# Altium PCB ESC_v0.PcbDoc (part 1 of 2)
Units mm, origin at the board's own origin, x right, y up, seen from the top; angles counter-clockwise.
Board outline 41.25 x 47.75 mm, 4 copper layers (Top Layer, Mid Layer 1, Mid Layer 2, Bottom Layer), stack 1.65 mm thick; 224 components, 141 nets, 1063 pads, 210 vias.
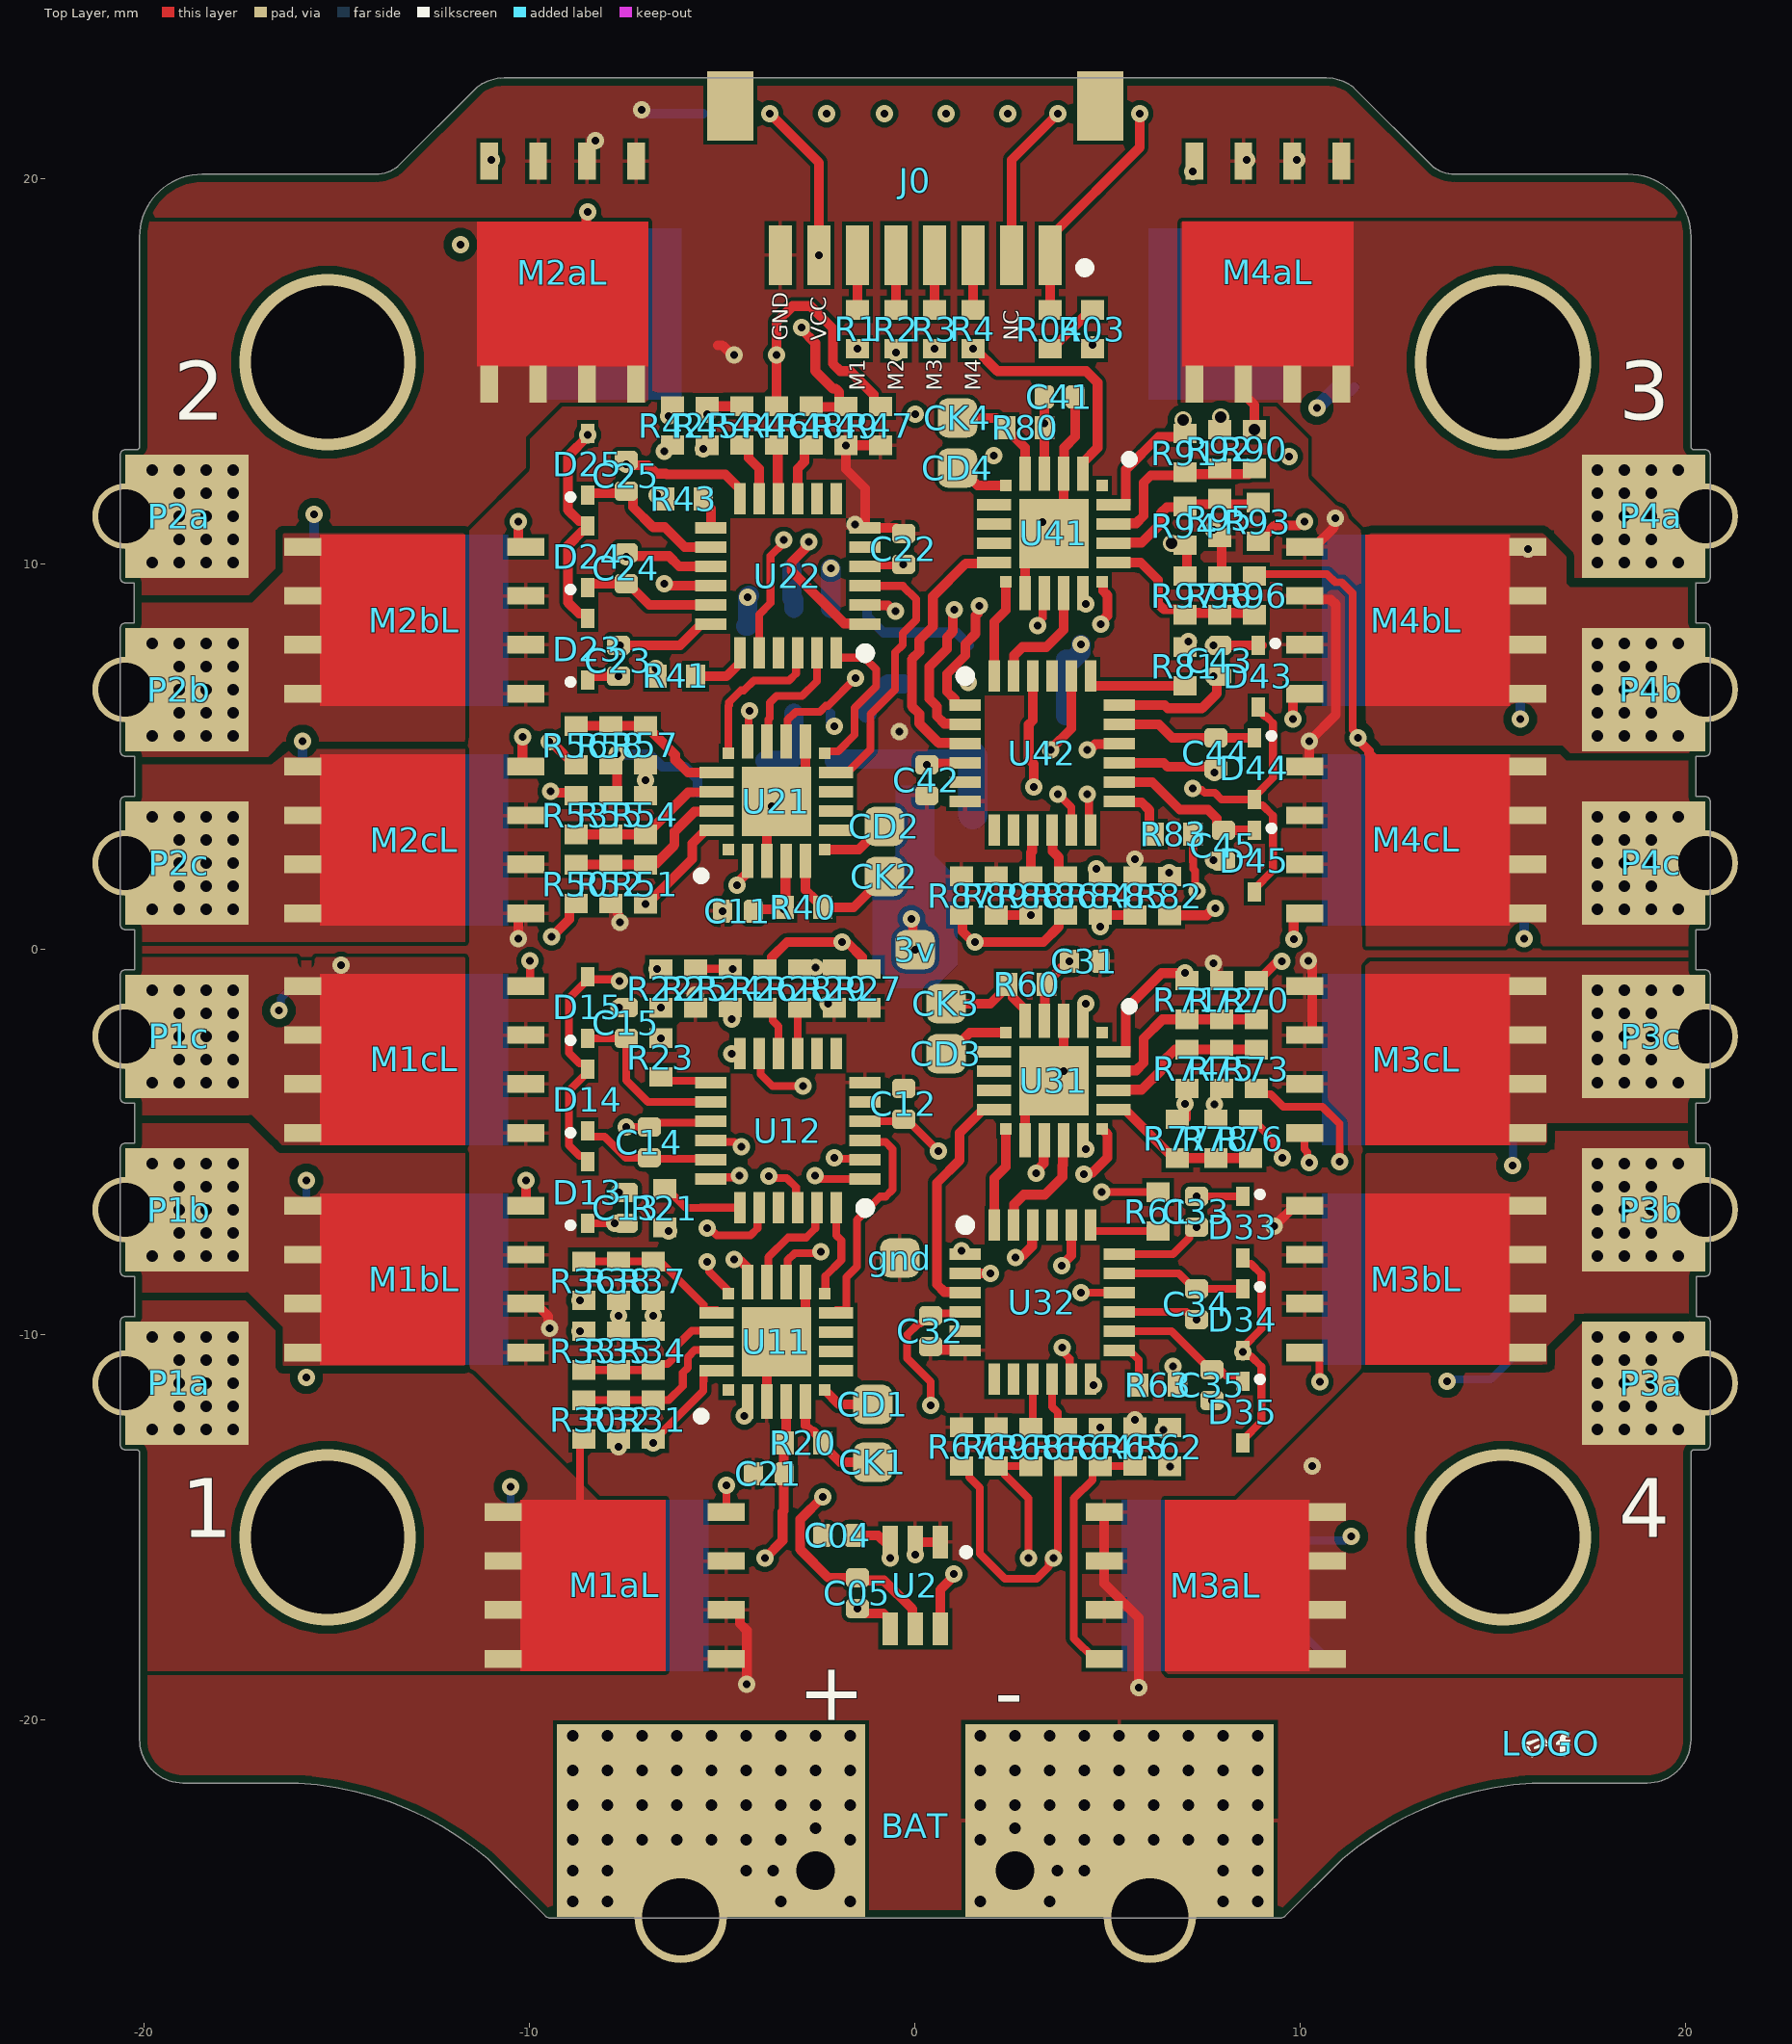
[diagram p0: Top Layer view]
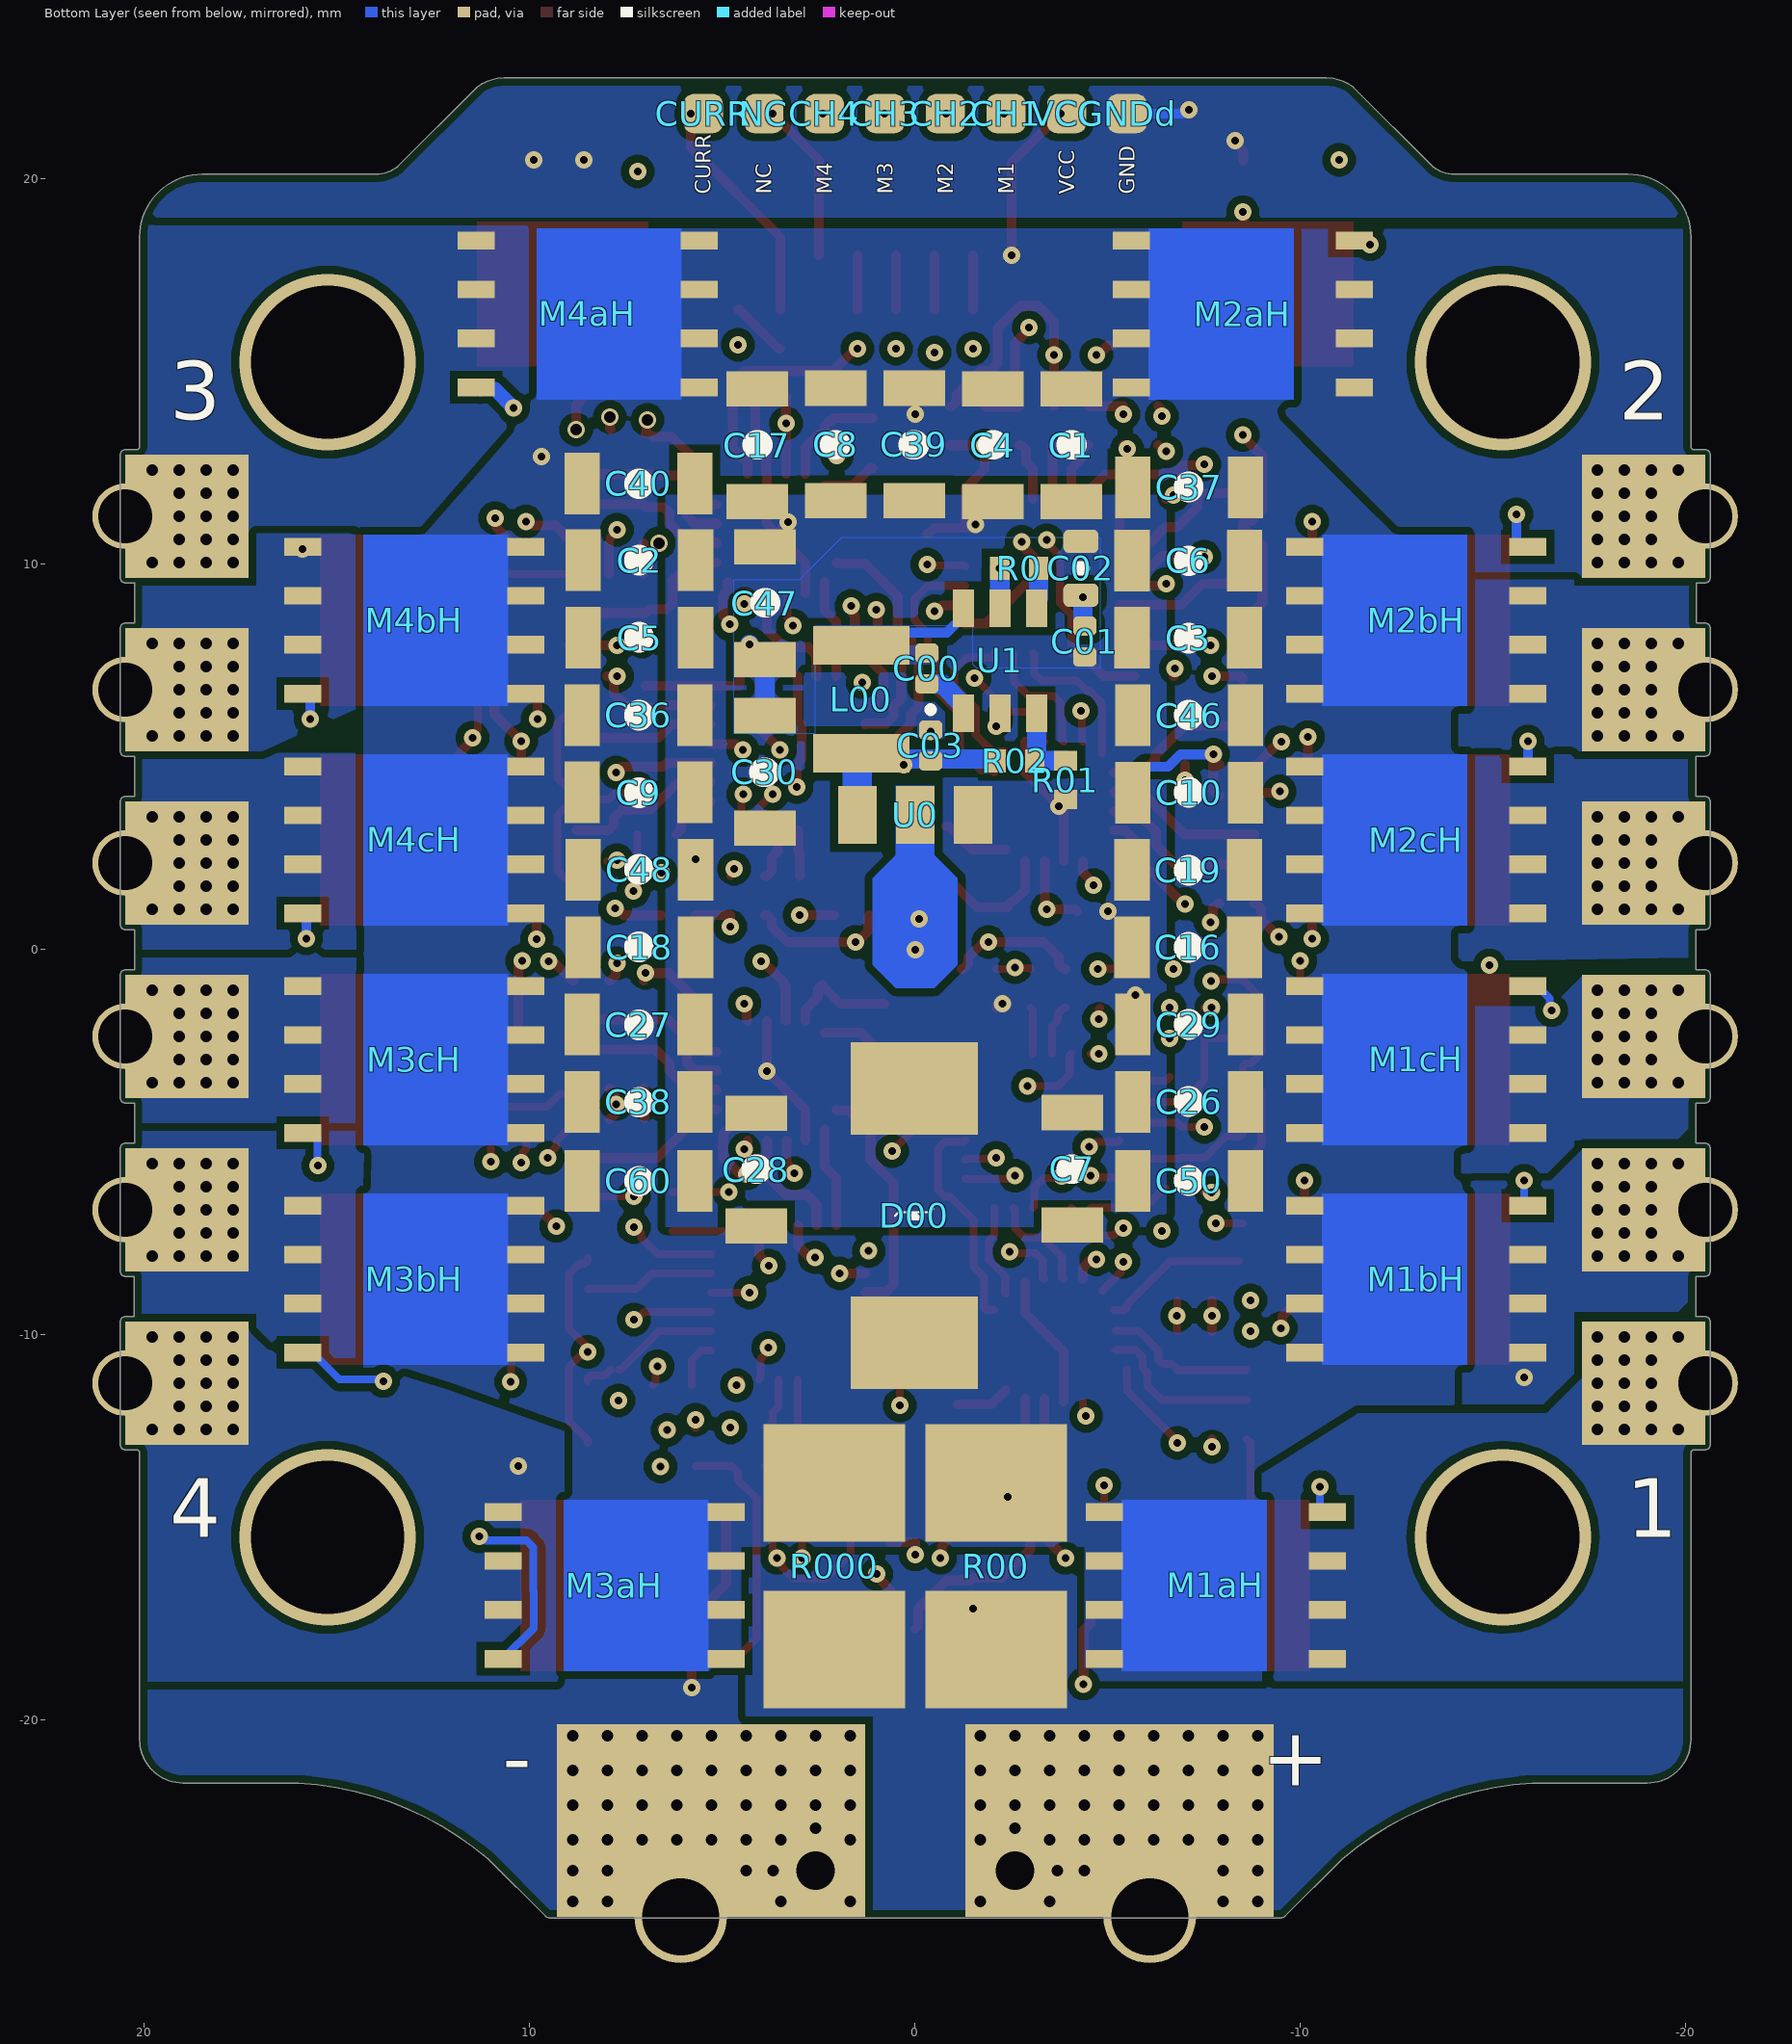
[diagram p1: Bottom Layer view, seen from below]
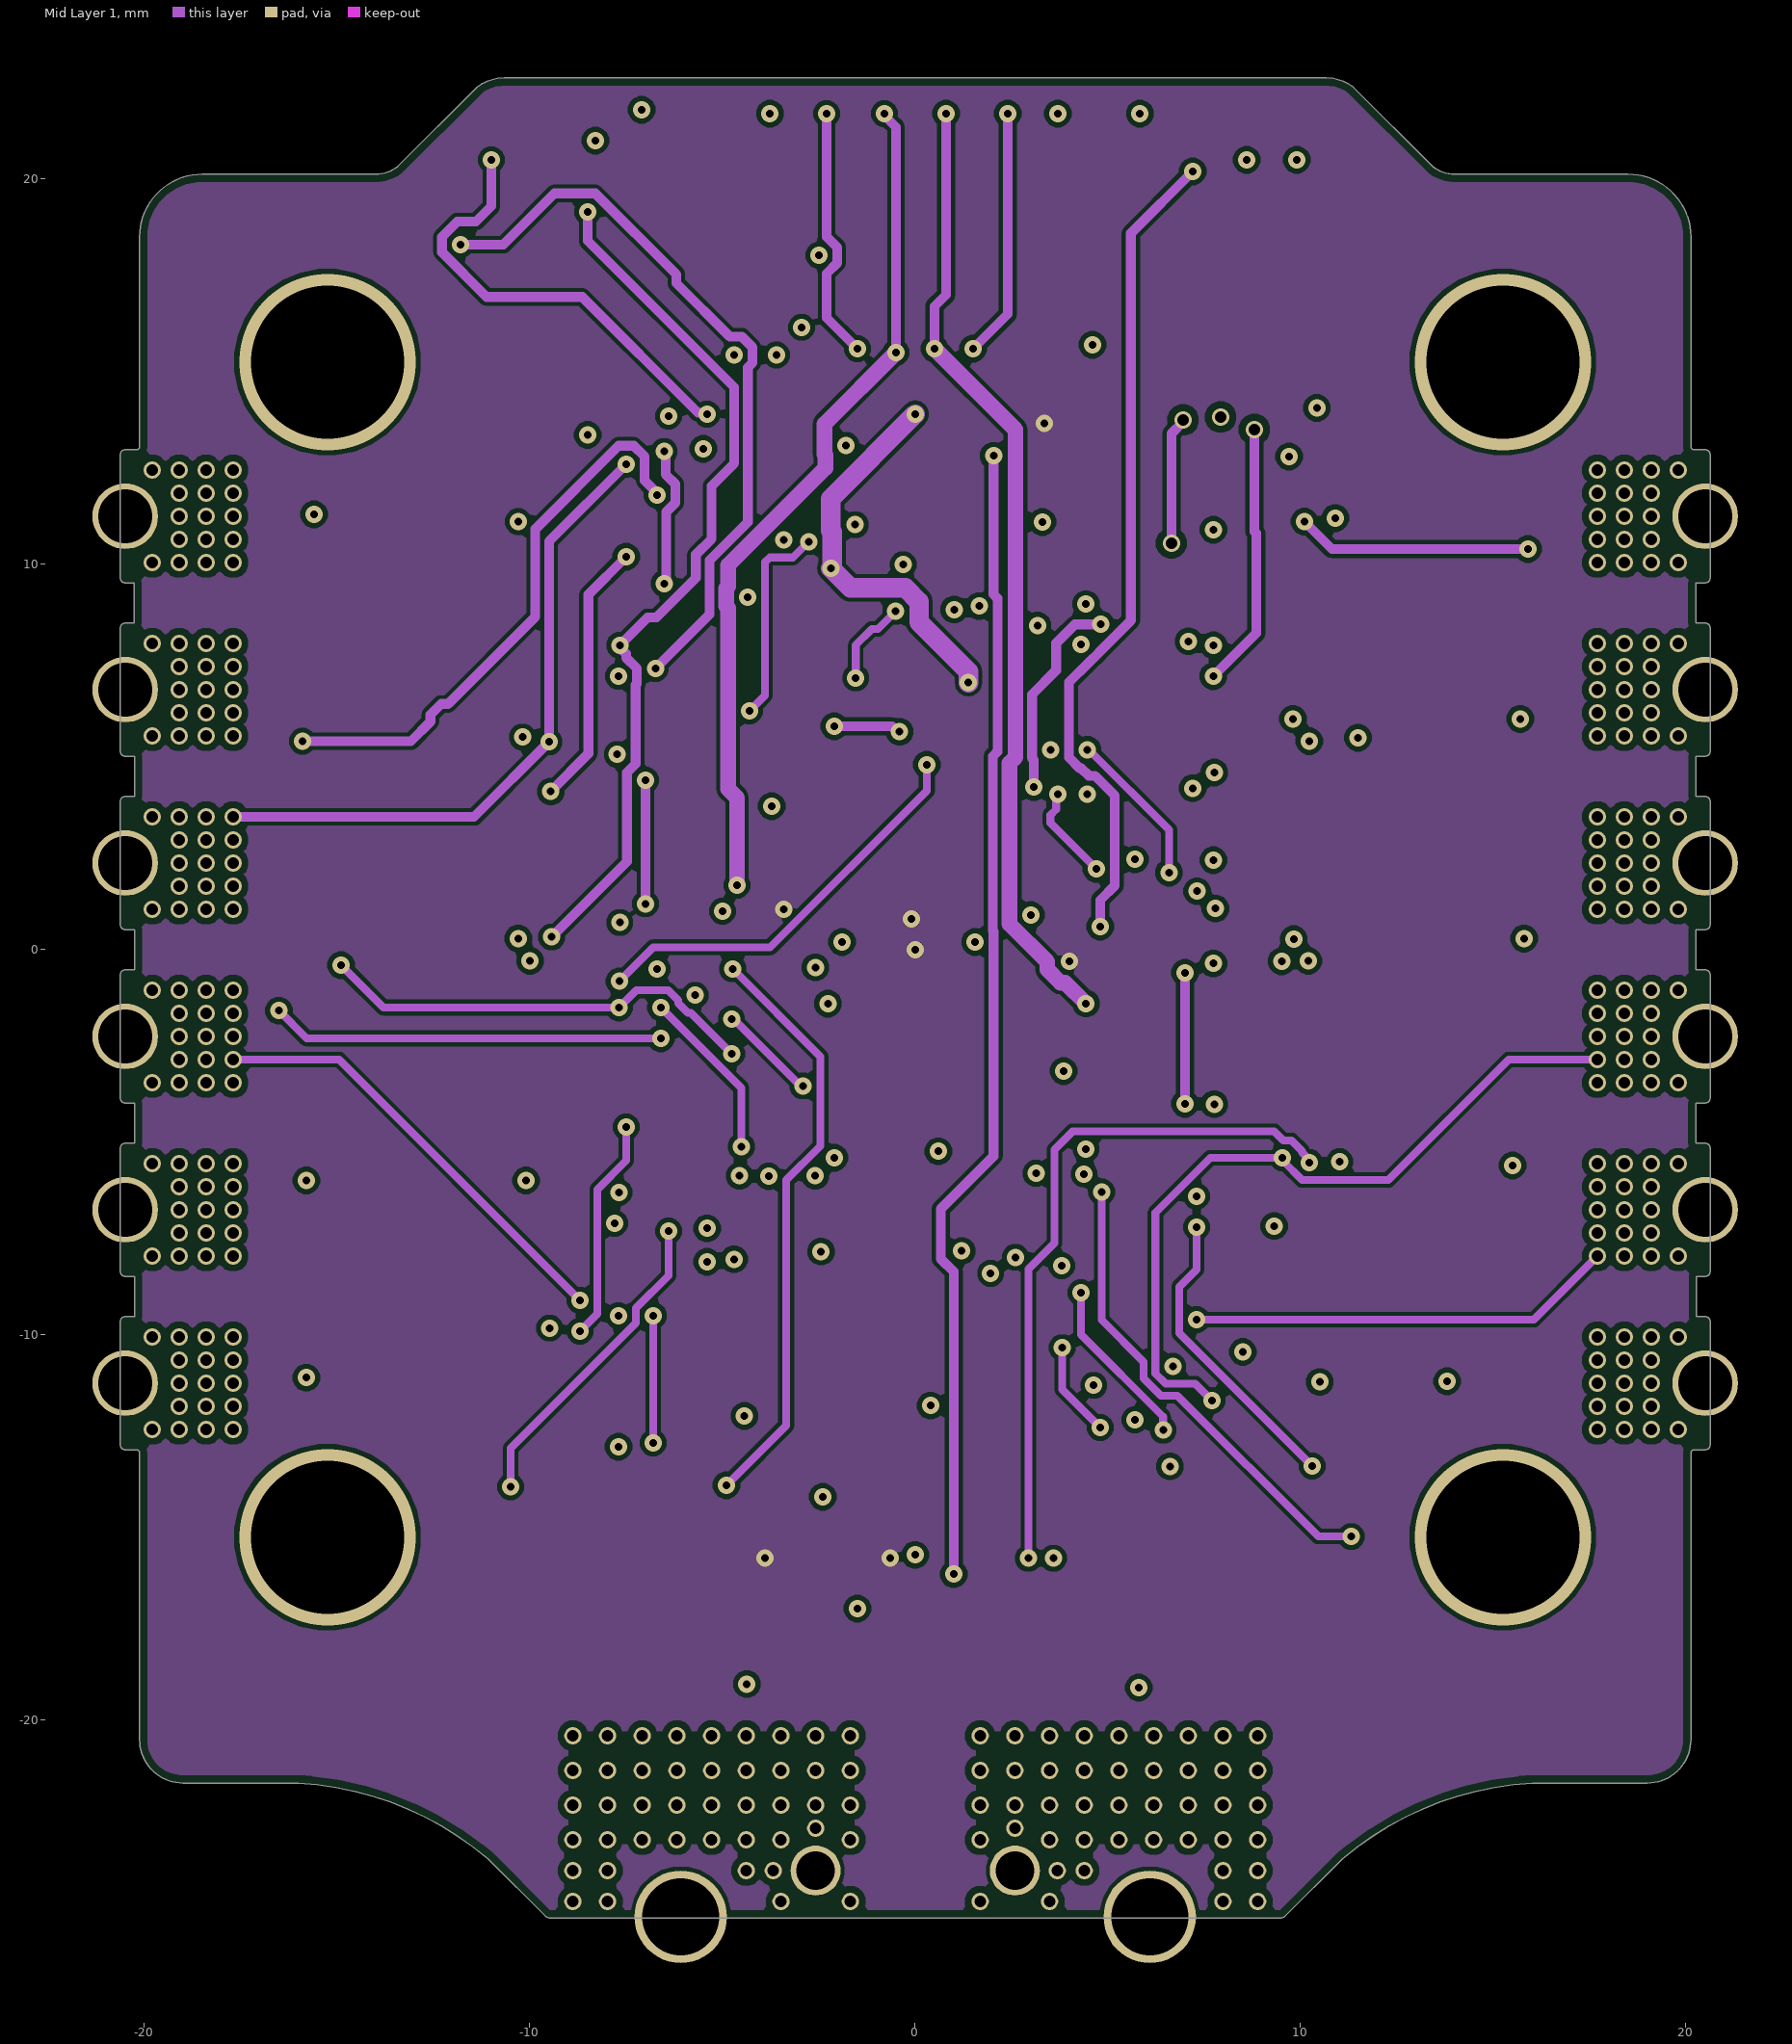
[diagram p2: Mid Layer 1]
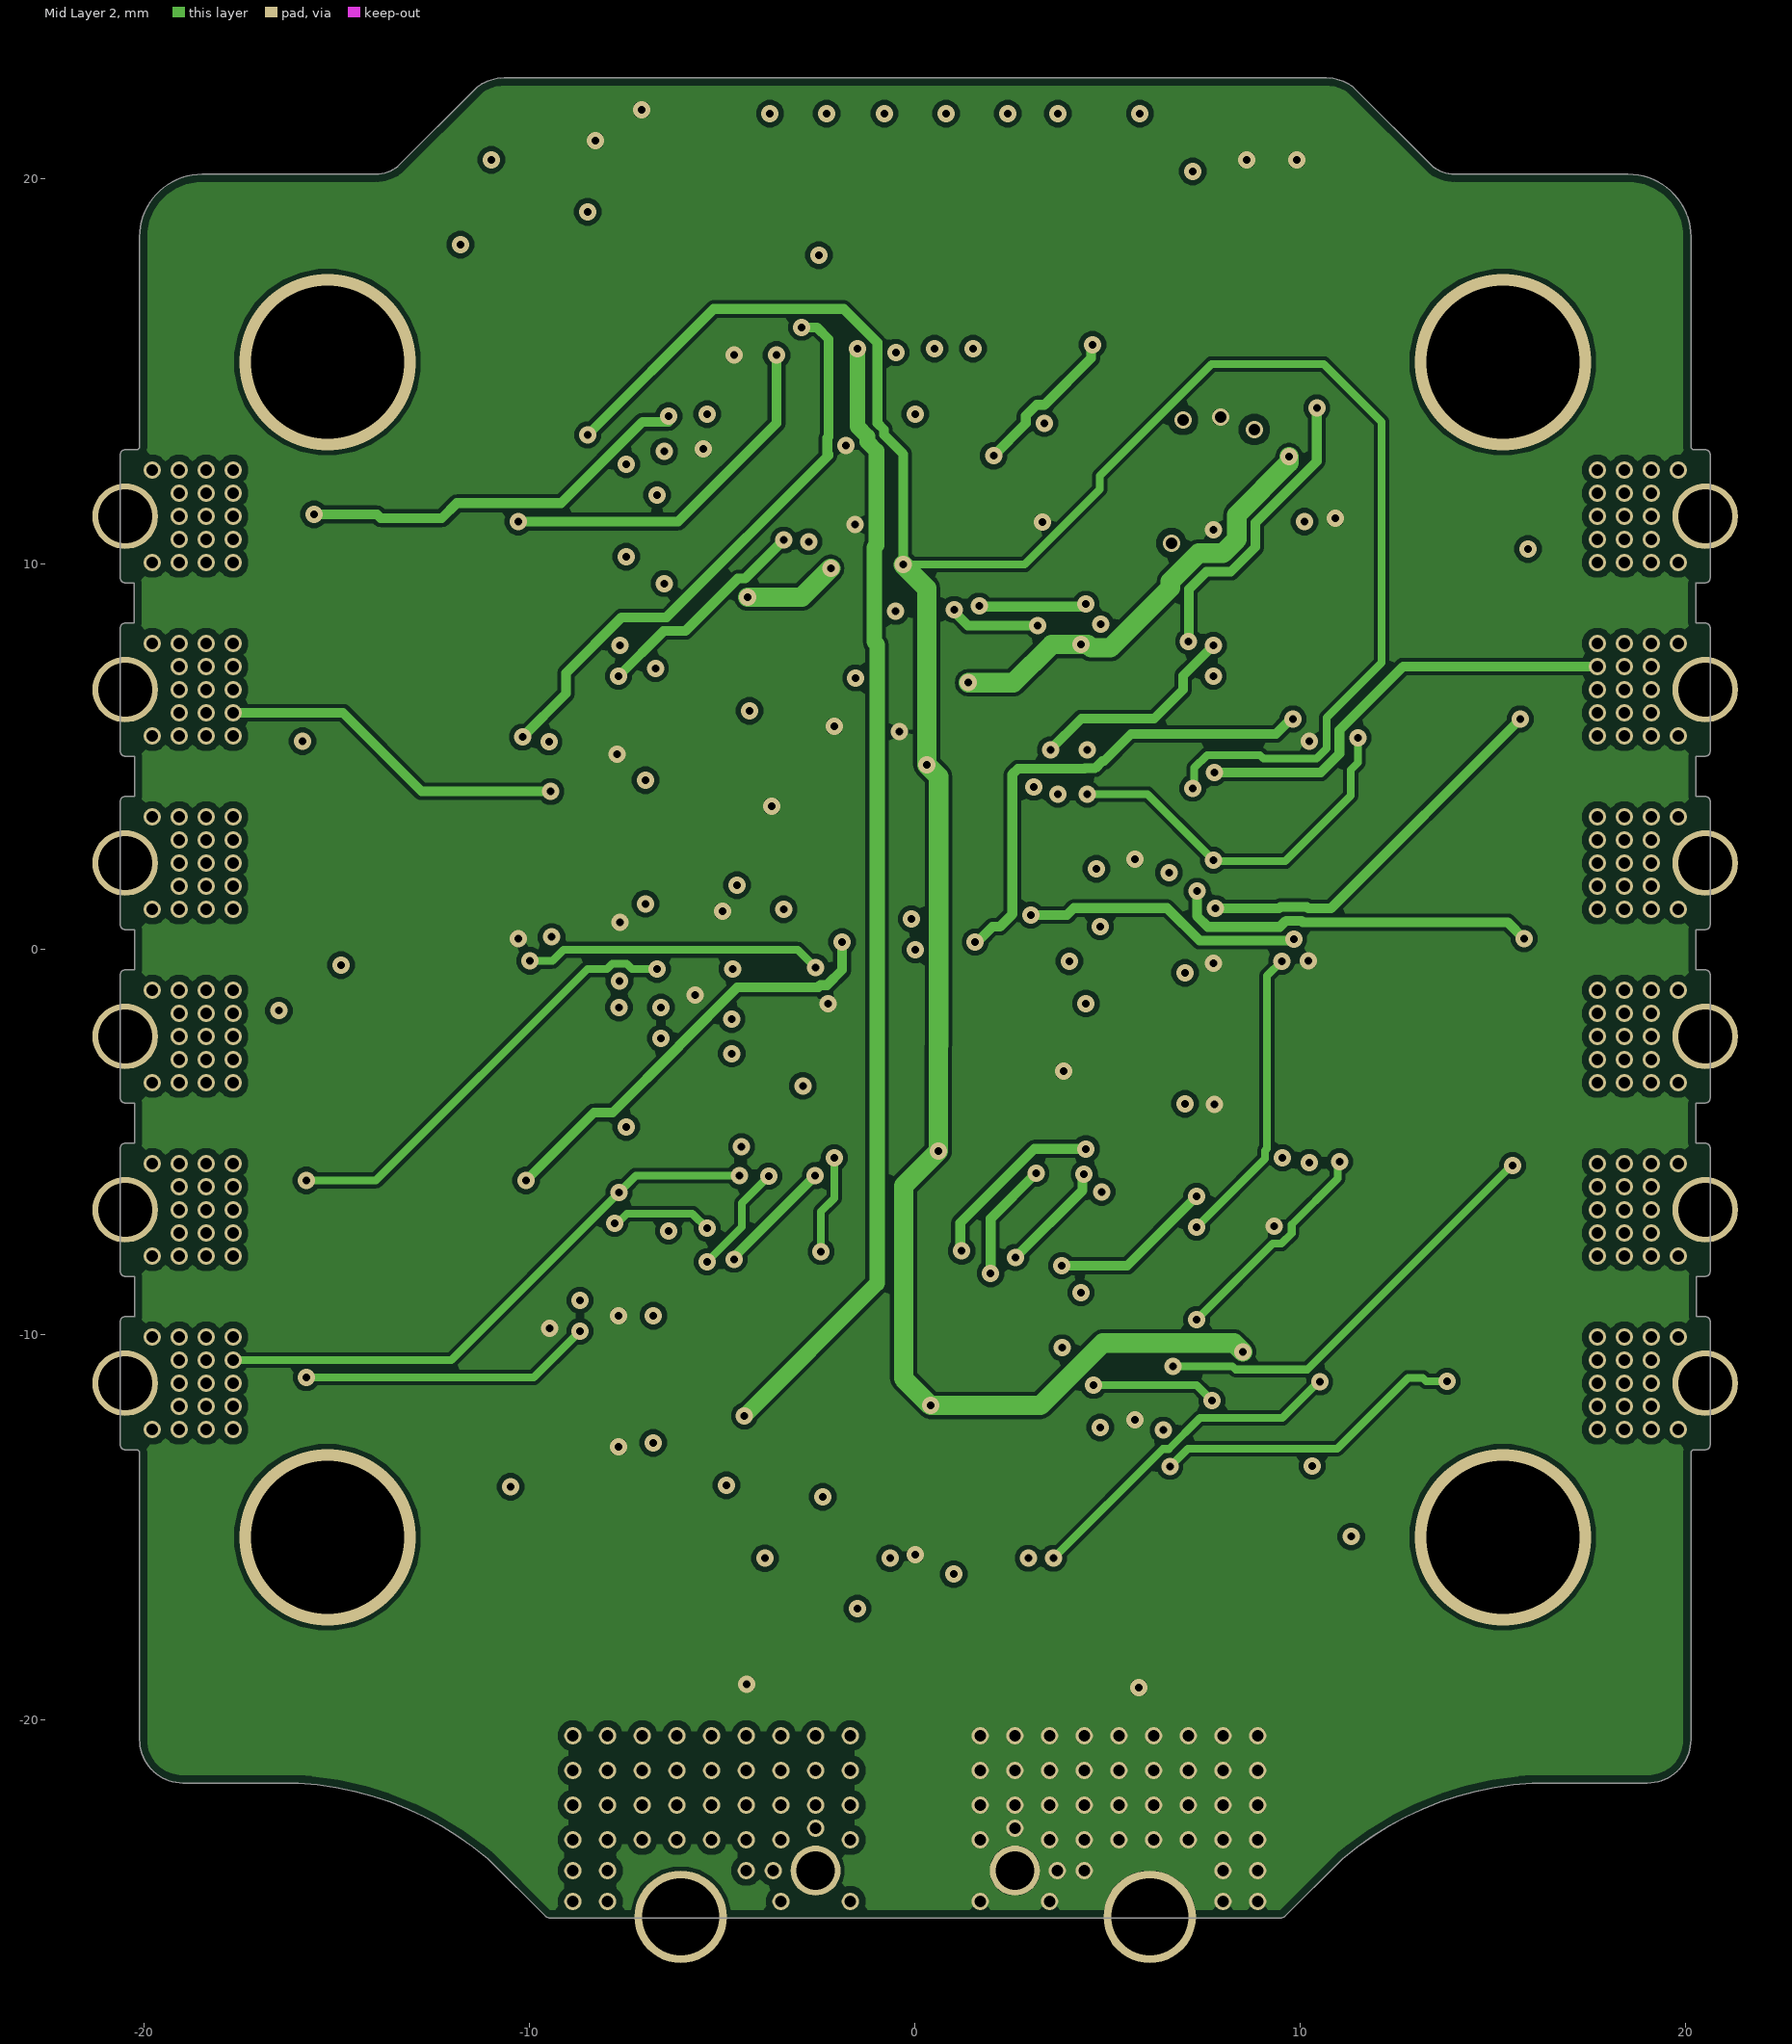
[diagram p3: Mid Layer 2]
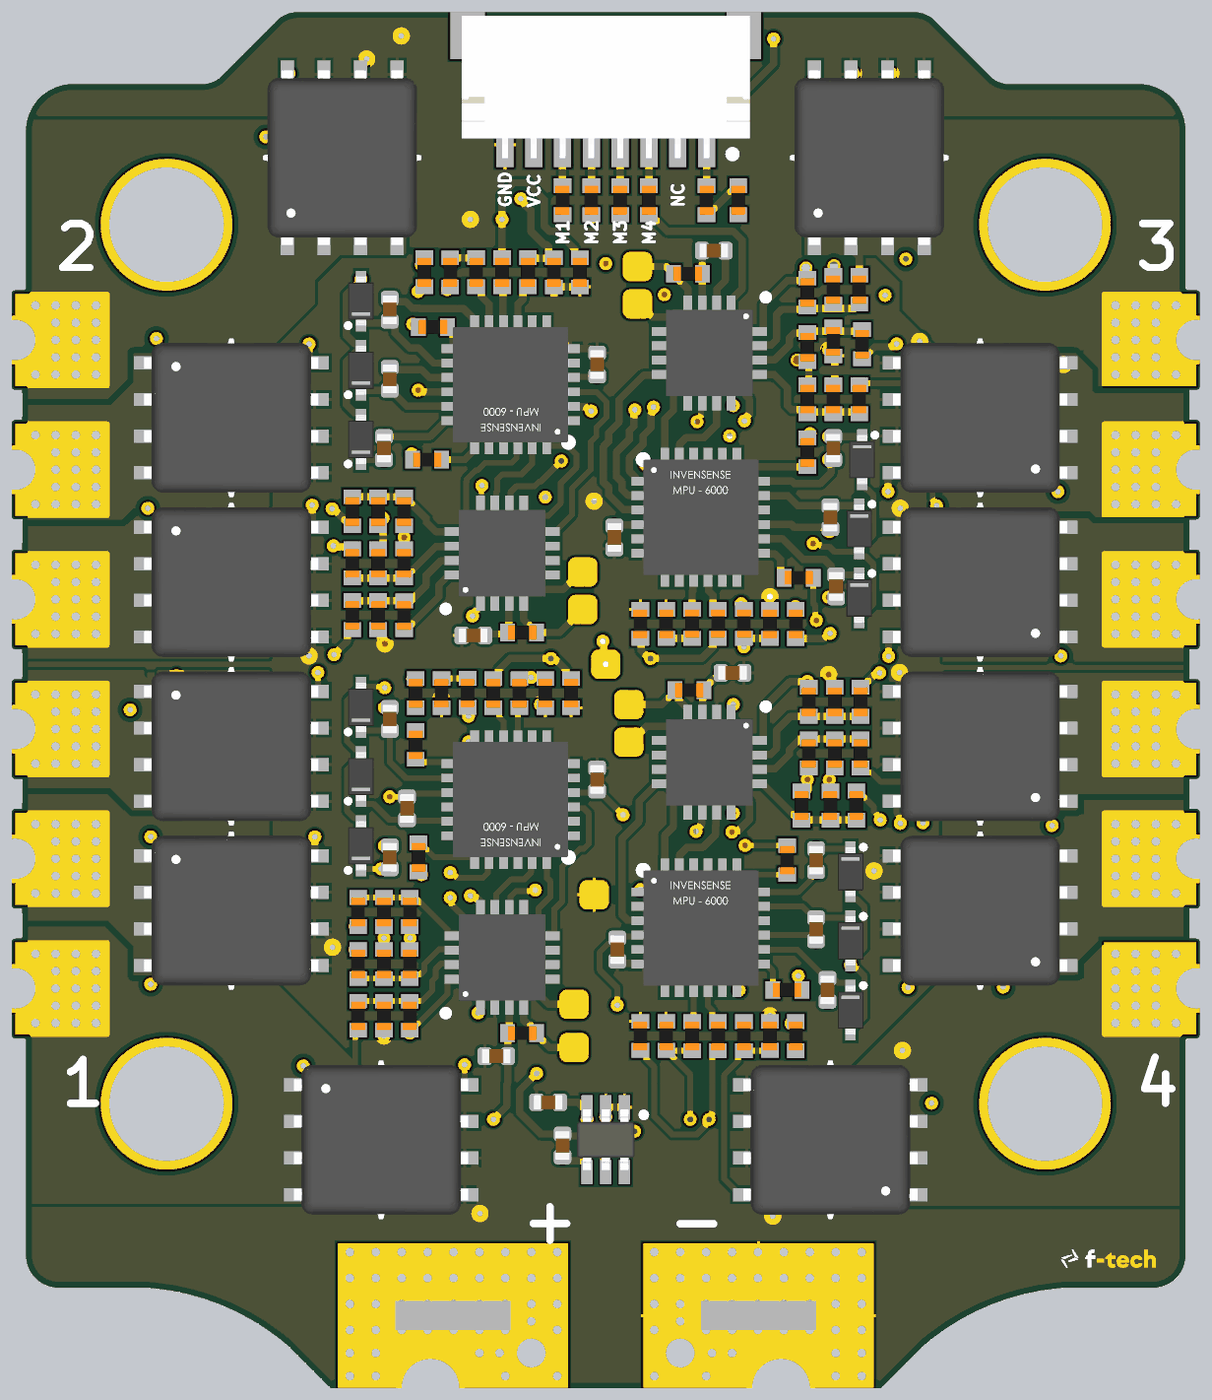
[diagram p5: 3D render of the assembled board from above, using the file's embedded part models]
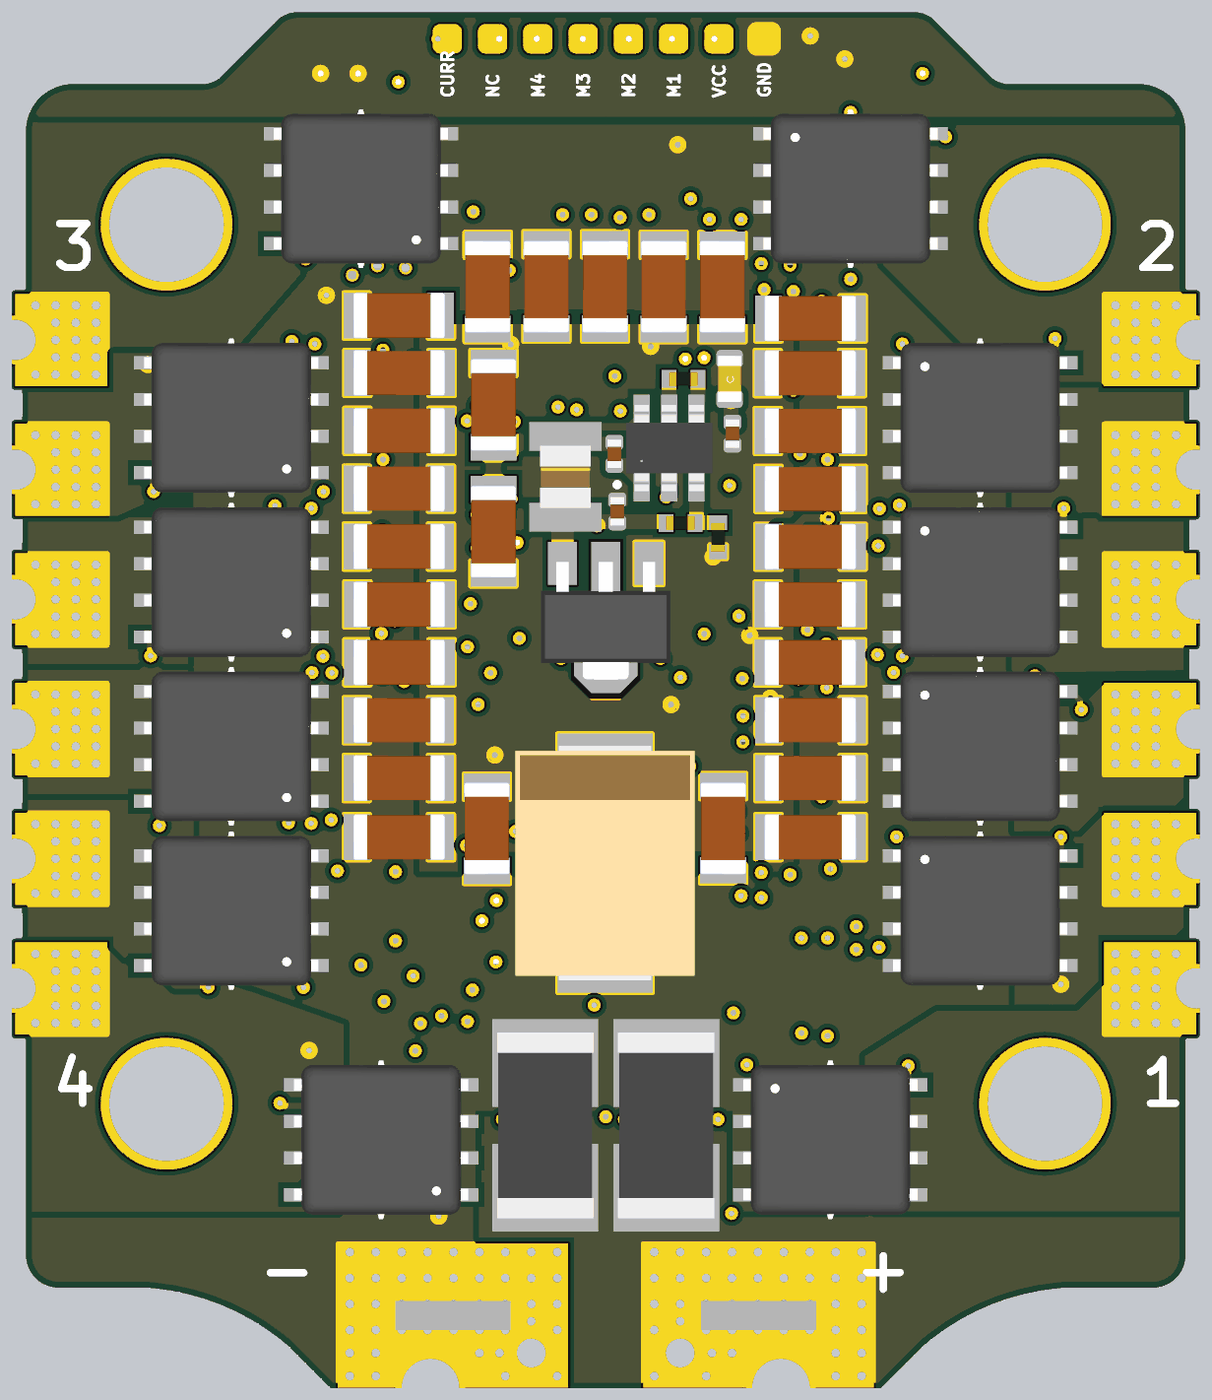
[diagram p6: 3D render of the assembled board from below, using the file's embedded part models]

## Layer stack, top to bottom
Top Solder: solder mask 0.0127, Solder Resist, Dk 3.8
Top Layer: signal copper 0.075
Dielectric 1: prepreg 0.1, 2313, Dk 4.05
Mid Layer 1: signal copper 0.0175
Core: core 1.265, FR-4, Dk 4.5
Mid Layer 2: signal copper 0.0175
Dielectric 2: prepreg 0.1, 2313, Dk 4.05
Bottom Layer: signal copper 0.075
Bottom Solder: solder mask 0.0127, Solder Resist, Dk 3.8

## Board outline
-20.5,-12.977 cw(c-20.5,-12.85) -20.627,-12.85 -20.627,-9.65 cw(c-20.5,-9.65) -20.5,-9.523 -20.256,-9.523 -20.255,-9.521 -20.255,-8.477 -20.5,-8.477 cw(c-20.5,-8.35) -20.627,-8.35 -20.627,-5.15 cw(c-20.5,-5.15) -20.5,-5.023 -20.256,-5.023 -20.256,-3.977 -20.5,-3.977 cw(c-20.5,-3.85) -20.627,-3.85 -20.627,-0.65 cw(c-20.5,-0.65) -20.5,-0.523 -20.255,-0.523 -20.255,0.523 -20.5,0.523 cw(c-20.5,0.65) -20.627,0.65 -20.627,3.85 cw(c-20.5,3.85) -20.5,3.977 -20.255,3.977 -20.255,5.023 -20.5,5.023 cw(c-20.5,5.15) -20.627,5.15 -20.627,8.35 cw(c-20.5,8.35) -20.5,8.477 -20.268,8.477 -20.268,9.523 -20.5,9.523 cw(c-20.5,9.65) -20.627,9.65 -20.627,12.85 cw(c-20.5,12.85) -20.5,12.977 -20.183,12.977 -20.127,13.033 -20.127,18.5 cw(c-18.5,18.5) -18.5,20.127 -13.99,20.127 ccw(c-13.99,21.022) -13.434,20.321 -11.366,22.389 -11.329,22.415 cw(c-10.67,21.5) -10.67,22.627 -10.65,22.627 8.125,22.627 8.126,22.627 10.65,22.627 10.67,22.627 cw(c10.67,21.5) 11.329,22.415 11.366,22.389 13.434,20.321 ccw(c13.99,21.022) 13.99,20.127 18.5,20.127 cw(c18.5,18.5) 20.127,18.5 20.127,13.031 20.181,12.977 20.5,12.977 cw(c20.5,12.85) 20.627,12.85 20.627,9.65 cw(c20.5,9.65) 20.5,9.523 20.256,9.523 20.255,9.521 20.255,8.477 20.5,8.477 cw(c20.5,8.35) 20.627,8.35 20.627,5.15 cw(c20.5,5.15) 20.5,5.023 20.256,5.023 20.256,3.977 20.5,3.977 cw(c20.5,3.85) 20.627,3.85 20.627,0.65 cw(c20.5,0.65) 20.5,0.523 20.255,0.523 20.255,-0.523 20.5,-0.523 cw(c20.5,-0.65) 20.627,-0.65 20.627,-3.85 cw(c20.5,-3.85) 20.5,-3.977 20.255,-3.977 20.255,-5.023 20.5,-5.023 cw(c20.5,-5.15) 20.627,-5.15 20.627,-8.35 cw(c20.5,-8.35) 20.5,-8.477 20.268,-8.477 20.268,-9.523 20.5,-9.523 cw(c20.5,-9.65) 20.627,-9.65 20.627,-12.85 cw(c20.5,-12.85) 20.5,-12.977 20.183,-12.977 20.127,-13.033 20.127,-20.5 cw(c19,-20.5) 19,-21.627 16.004,-21.627 ccw(c16.5,-30) 11.086,-23.594 9.59,-25.09 9.5,-25.127 -9.5,-25.127 -9.59,-25.09 -11.086,-23.594 ccw(c-16.5,-30) -16.004,-21.627 -19,-21.627 cw(c-19,-20.5) -20.127,-20.5 -20.127,-13.031 -20.181,-12.977

## Design rules (kind name [scope] priority, off if disabled: settings)
BoardOutlineClearance [All] p1: gap=0.2 ignorepadtopadclearanceinfootprint=FALSE
Clearance [All] p1: gap=0.102 ignorepadtopadclearanceinfootprint=FALSE except(0.127: Arc-Via Track-Via SMDPad-Via THPad-Via Via-Via Via-Fill Via-Poly Via-Region Via-Text; 0.25: Arc-Hole Track-Hole SMDPad-Hole THPad-Hole Via-Hole Fill-Hole Poly-Hole Region-Hole Text-Hole)
ComponentClearance [All] p1: gap=0.102 collisioncheckmode=3 verticalgap=0.102 showdistances=TRUE
DiffPairsRouting [All] p1: maxlimit=0.102 minlimit=0.102 mostfreqgap=0.102 toplayer_minwidth=0.102 toplayer_maxwidth=1816.048 toplayer_prefwidth=0.102 midlayer1_minwidth=0.102 midlayer1_maxwidth=1816.048 midlayer1_prefwidth=0.102 midlayer2_minwidth=0.102 midlayer2_maxwidth=1816.048 midlayer2_prefwidth=0.102 bottomlayer_minwidth=0.102 bottomlayer_maxwidth=1816.048 bottomlayer_prefwidth=0.102 maxuncoupledlength=12.7
Height [All] p1: minheight=0 maxheight=1816.048 prefheight=12.7
HoleSize [All] p1: absolutevalues=TRUE maxlimit=6.3 minlimit=0.2 maxpercent=80.000 minpercent=20.000
HoleToHoleClearance [All] p1: gap=0.25 allowstackedmicrovias=FALSE
MinimumAnnularRing [All] p1: minimumring=0.074
MinimumSolderMaskSliver [All] p1: minsoldermaskwidth=0
PlaneClearance [All] p1: clearance=0.102
PlaneConnect PlaneConnectPowerPads [InPadClass('PowerPads')] p1: planeconnectstyle=Direct reliefexpansion=0.508 reliefentries=4 reliefconductorwidth=0.254 reliefairgap=0.254
PlaneConnect [All] p2: pad.planeconnectstyle=Relief pad.reliefexpansion=0.3 pad.reliefentries=4 pad.reliefconductorwidth=0.102 pad.reliefairgap=0.102 via.planeconnectstyle=Direct via.reliefexpansion=0.3 via.reliefentries=4 via.reliefconductorwidth=0.127 via.reliefairgap=0.127
PolygonConnect PolygonConnectPowerPads [All vs (InPadClass('PowerPads'))] p1: connectstyle=Direct reliefconductorwidth=0.254 reliefentries=4 polygonreliefangle="90 Angle" airgapwidth=0.254
PolygonConnect [All] p2: thpad.connectstyle=Relief thpad.reliefconductorwidth=0.102 thpad.reliefentries=4 thpad.polygonreliefangle="90 Angle" thpad.airgapwidth=0.102 smdpad.connectstyle=Relief smdpad.reliefconductorwidth=0.102 smdpad.reliefentries=4 smdpad.polygonreliefangle="90 Angle" smdpad.airgapwidth=0.102 via.connectstyle=Direct via.reliefconductorwidth=0.127 via.reliefentries=4 via.polygonreliefangle="90 Angle" via.airgapwidth=0.127
RoutingVias [All] p1: holewidth=0.2 width=0.45 viastyle="Through Hole" minholewidth=0.2 minwidth=0.45 maxholewidth=6.3 maxwidth=6.55
SilkToSilkClearance [All] p1: silktosilkclearance=0
SilkToSolderMaskClearance [IsPad] p1: minsilkscreentomaskgap=0.102 clearancetoexposedcopper=TRUE
SolderMaskExpansion [All] p1: expansion=0.075 istentingtop=FALSE
Width [All] p1: maxlimit=1816.048 minlimit=0.102 preferedwidth=0.102
20 further rules are at their usual default settings.

## Classes and differential pairs
component class mcu: C31 C32 C33 C34 C35 C41 C42 C43 C44 C45 CD3 CD4 CK3 CK4 D33 D34 D35 D43 D44 D45 R60 R61 R62 R63 R64 R65 R66 R67 R68 R69 R70 R71 R72 R73 R74 R75 R76 R77 R78 R80 R81 R82 R83 R84 R85 R86 R87 R88 R89 R90 R91 R92 R93 R94 R95 R96 R97 R98 U31 U32 U41 U42
component class mcu2: C11 C12 C13 C14 C15 C21 C22 C23 C24 C25 CD1 CD2 CK1 CK2 D13 D14 D15 D23 D24 D25 R20 R21 R22 R23 R24 R25 R26 R27 R28 R29 R30 R31 R32 R33 R34 R35 R36 R37 R38 R40 R41 R42 R43 R44 R45 R46 R47 R48 R49 R50 R51 R52 R53 R54 R55 R56 R57 R58 U11 U12 U21 U22
component class main: 3v BAT C00 C01 C1 C2 C02 C03 C3 C4 C04 C05 C5 C6 C7 C8 C9 C10 C16 C17 C18 C19 C26 C27 C28 C29 C30 C36 C37 C38 C39 C40 C46 C47 C48 C50 C60 CH1 CH2 CH3 CH4 CURR D00 gnd GNDd J0 L00 LOGO M1aH M1aL M1bH M1bL M1cH M1cL M2aH M2aL M2bH M2bL M2cH M2cL M3aH M3aL M3bH M3bL M3cH M3cL M4aH M4aL M4bH M4bL M4cH M4cL NC P1a P1b P1c P2a P2b P2c P3a P3b P3c P4a P4b P4c R0 R000 R00 R1 R01 R02 R2 R3 R03 R04 R4 U0 U1 U2 VCC

## Components (designator, comment, footprint, x,y, rotation, side; value= is the part's Value field where it differs from the comment)
3v "PAD.04" PAD.04X.04#1 0,0 r0 top
BAT "X PAD.PWR" PAD6x8 -5.3,-22.1 r270 top
C00 "CAP0402_0u1_50V_X7R" 0402-CAP -0.3,7.3 r270 bottom value=0u1
C1 "CAP1206_22u_35V_X5R" 1206-CAP -4.05,13.1 r270 bottom value=22uF
C01 "CAP0402_0u1_50V_X7R" 0402-CAP -4.4,8 r270 bottom value=0u1
C2 "CAP1206_22u_35V_X5R" 1206-CAP 7.173,10.107 r180 bottom value=22uF
C02 "CAP0603_4u7_35V_X5R" 0603-CAP -4.3,9.9 r90 bottom value=4.7u
C3 "CAP1206_22u_35V_X5R" 1206-CAP -7.1,8.093 r0 bottom value=22uF
C03 "CAP0402_10u_10V_X5R" 0402-CAP -0.4,5.3 r90 bottom value=10u
C4 "CAP1206_22u_35V_X5R" 1206-CAP -2.012,13.1 r270 bottom value=22uF
C04 "CAP0402_0u1_16V_X7R" 0402-CAP -2,-15.2 r180 top value=0u1
C5 "CAP1206_22u_35V_X5R" 1206-CAP 7.173,8.099 r180 bottom value=22uF
C05 "CAP0402_1n_50V_X7R" 0402-CAP -1.5,-16.7 r90 top value=1n
C6 "CAP1206_22u_35V_X5R" 1206-CAP -7.1,10.1 r0 bottom value=22uF
C7 "CAP1206_22u_35V_X5R" 1206-CAP -4.075,-5.7 r90 bottom value=22uF
C8 "CAP1206_22u_35V_X5R" 1206-CAP 2.063,13.1 r90 bottom value=22uF
C9 "CAP1206_22u_35V_X5R" 1206-CAP 7.173,4.083 r0 bottom value=22uF
C10 "CAP1206_22u_35V_X5R" 1206-CAP -7.1,4.079 r180 bottom value=22uF
C11 "CAP0402_0u1_16V_X7R" 0402-CAP -4.6,1 r180 top value=0u1
C12 "CAP0402_0u1_16V_X7R" 0402-CAP -0.3,-4 r90 top value=0u1
C13 "CAP0402_1u_16V_X5R" 0402-CAP -7.5,-6.7 r90 top value=1u
C14 "CAP0402_1u_16V_X5R" 0402-CAP -6.9,-5 r90 top value=1u
C15 "CAP0402_1u_16V_X5R" 0402-CAP -7.5,-1.9 r90 top value=1u
C16 "CAP1206_22u_35V_X5R" 1206-CAP -7.1,0.064 r0 bottom value=22uF
C17 "CAP1206_22u_35V_X5R" 1206-CAP 4.1,13.1 r270 bottom value=22uF
C18 "CAP1206_22u_35V_X5R" 1206-CAP 7.173,0.066 r180 bottom value=22uF
C19 "CAP1206_22u_35V_X5R" 1206-CAP -7.1,2.071 r0 bottom value=22uF
C21 "CAP0402_0u1_16V_X7R" 0402-CAP -3.8,-13.6 r180 top value=0u1
C22 "CAP0402_0u1_16V_X7R" 0402-CAP -0.3,10.4 r90 top value=0u1
C23 "CAP0402_1u_16V_X5R" 0402-CAP -7.7,7.5 r90 top value=1u
C24 "CAP0402_1u_16V_X5R" 0402-CAP -7.5,9.9 r90 top value=1u
C25 "CAP0402_1u_16V_X5R" 0402-CAP -7.5,12.3 r90 top value=1u
C26 "CAP1206_22u_35V_X5R" 1206-CAP -7.1,-3.95 r180 bottom value=22uF
C27 "CAP1206_22u_35V_X5R" 1206-CAP 7.173,-1.942 r0 bottom value=22uF
C28 "CAP1206_22u_35V_X5R" 1206-CAP 4.125,-5.7 r270 bottom value=22uF
C29 "CAP1206_22u_35V_X5R" 1206-CAP -7.1,-1.943 r180 bottom value=22uF
C30 "CAP1206_22u_35V_X5R" 1206-CAP 3.9,4.6 r90 bottom value=22uF
C31 "CAP0402_0u1_16V_X7R" 0402-CAP 4.4,-0.3 r0 top value=0u1
C32 "CAP0402_0u1_16V_X7R" 0402-CAP 0.4,-9.9 r270 top value=0u1
C33 "CAP0402_1u_16V_X5R" 0402-CAP 7.3,-6.8 r270 top value=1u
C34 "CAP0402_1u_16V_X5R" 0402-CAP 7.3,-9.2 r270 top value=1u
C35 "CAP0402_1u_16V_X5R" 0402-CAP 7.7,-11.3 r270 top value=1u
C36 "CAP1206_22u_35V_X5R" 1206-CAP 7.173,6.091 r0 bottom value=22uF
C37 "CAP1206_22u_35V_X5R" 1206-CAP -7.1,12 r180 bottom value=22uF
C38 "CAP1206_22u_35V_X5R" 1206-CAP 7.173,-3.95 r0 bottom value=22uF
C39 "CAP1206_22u_35V_X5R" 1206-CAP 0.025,13.1 r90 bottom value=22uF
C40 "CAP1206_22u_35V_X5R" 1206-CAP 7.173,12.1 r0 bottom value=22uF
C41 "CAP0402_0u1_16V_X7R" 0402-CAP 3.75,14.35 r0 top value=0u1
C42 "CAP0402_0u1_16V_X7R" 0402-CAP 0.3,4.4 r270 top value=0u1
C43 "CAP0402_1u_16V_X5R" 0402-CAP 7.9,7.5 r270 top value=1u
C44 "CAP0402_1u_16V_X5R" 0402-CAP 7.8,5.1 r270 top value=1u
C45 "CAP0402_1u_16V_X5R" 0402-CAP 8,2.7 r270 top value=1u
C46 "CAP1206_22u_35V_X5R" 1206-CAP -7.1,6.086 r180 bottom value=22uF
C47 "CAP1206_22u_35V_X5R" 1206-CAP 3.9,9 r270 bottom value=22uF
C48 "CAP1206_22u_35V_X5R" 1206-CAP 7.173,2.074 r180 bottom value=22uF
C50 "CAP1206_22u_35V_X5R" 1206-CAP -7.1,-6 r180 bottom value=22uF
C60 "CAP1206_22u_35V_X5R" 1206-CAP 7.173,-6 r0 bottom value=22uF
CD1 "PAD.04" PAD.04X.04#2 -0.3,-11.4 r270 top
CD2 "PAD.04" PAD.04X.04#1 -0.8,3.2 r270 top
CD3 "PAD.04" PAD.04X.04#2 0,-3.1 r90 top
CD4 "PAD.04" PAD.04X.04#3 1.1,12.1 r90 top
CH1 "PAD.04" PAD.04X.04#1 -2.357,21.7 r90 bottom
CH2 "PAD.04" PAD.04X.04#1 -0.786,21.7 r90 bottom
CH3 "PAD.04" PAD.04X.04#1 0.786,21.7 r90 bottom
CH4 "PAD.04" PAD.04X.04#1 2.357,21.7 r90 bottom
CK1 "PAD.04" PAD.04X.04#2 -0.3,-12.9 r270 top
CK2 "PAD.04" PAD.04X.04#1 -0.8,1.9 r270 top
CK3 "PAD.04" PAD.04X.04#2 0,-1.8 r90 top
CK4 "PAD.04" PAD.04X.04#3 1.1,13.4 r90 top
CURR "PAD.04" PAD.04X.04#1 5.5,21.7 r90 bottom
D00 "DTVS_SMDJ28CA" SMC-TVS 0.025,-6.9 r270 bottom
D13 "DPWR_1N4148WT" SOD-523_0P9X1P3 -8.5,-6.3 r90 top
D14 "DPWR_1N4148WT" SOD-523_0P9X1P3 -8.5,-3.9 r90 top
D15 "DPWR_1N4148WT" SOD-523_0P9X1P3 -8.5,-1.5 r90 top
D23 "DPWR_1N4148WT" SOD-523_0P9X1P3 -8.5,7.8 r90 top
D24 "DPWR_1N4148WT" SOD-523_0P9X1P3 -8.5,10.2 r90 top
D25 "DPWR_1N4148WT" SOD-523_0P9X1P3 -8.5,12.6 r90 top
D33 "DPWR_1N4148WT" SOD-523_0P9X1P3 8.5,-7.2 r270 top
D34 "DPWR_1N4148WT" SOD-523_0P9X1P3 8.5,-9.6 r270 top
D35 "DPWR_1N4148WT" SOD-523_0P9X1P3 8.5,-12 r270 top
D43 "DPWR_1N4148WT" SOD-523_0P9X1P3 8.9,7.1 r270 top
D44 "DPWR_1N4148WT" SOD-523_0P9X1P3 8.8,4.7 r270 top
D45 "DPWR_1N4148WT" SOD-523_0P9X1P3 8.8,2.3 r270 top
gnd "PAD.04" PAD.04X.04#1 -0.4,-8 r90 top
GNDd "PAD.04" PAD.04X.04#1 -5.5,21.7 r90 bottom
J0 "CON R/A SM08B-SRSS-TB" JST_SM08B-SRSS-TB 0,22.8 r180 top locked
L00 "IND1210_6u8" 1210-IND 1.4,6.5 r270 bottom value=6.8uH
LOGO "00 LOGO FTECH" 00FTECH 16.5,-20.6 r0 top
M1aH "NMOS PWR ME7170" 8DFN4.9X5.8 -7.8,-16.5 r0 bottom
M1aL "NMOS PWR ME7170" 8DFN4.9X5.8 -7.8,-16.5 r180 top locked
M1bH "NMOS PWR ME7170" 8DFN4.9X5.8 -13,-8.55 r0 bottom
M1bL "NMOS PWR ME7170" 8DFN4.9X5.8 -13,-8.55 r180 top locked
M1cH "NMOS PWR ME7170" 8DFN4.9X5.8 -13,-2.85 r0 bottom
M1cL "NMOS PWR ME7170" 8DFN4.9X5.8 -13,-2.85 r180 top locked
M2aH "NMOS PWR ME7170" 8DFN4.9X5.8 -8.5,16.5 r0 bottom
M2aL "NMOS PWR ME7170" 8DFN4.9X5.8 -9.15,17.575 r270 top locked
M2bH "NMOS PWR ME7170" 8DFN4.9X5.8 -13,8.55 r0 bottom
M2bL "NMOS PWR ME7170" 8DFN4.9X5.8 -13,8.55 r180 top locked
M2cH "NMOS PWR ME7170" 8DFN4.9X5.8 -13,2.85 r0 bottom
M2cL "NMOS PWR ME7170" 8DFN4.9X5.8 -13,2.85 r180 top locked
M3aH "NMOS PWR ME7170" 8DFN4.9X5.8 7.8,-16.5 r180 bottom
M3aL "NMOS PWR ME7170" 8DFN4.9X5.8 7.8,-16.5 r0 top locked
M3bH "NMOS PWR ME7170" 8DFN4.9X5.8 13,-8.55 r180 bottom
M3bL "NMOS PWR ME7170" 8DFN4.9X5.8 13,-8.55 r0 top locked
M3cH "NMOS PWR ME7170" 8DFN4.9X5.8 13,-2.85 r180 bottom
M3cL "NMOS PWR ME7170" 8DFN4.9X5.8 13,-2.85 r0 top locked
M4aH "NMOS PWR ME7170" 8DFN4.9X5.8 8.5,16.5 r180 bottom
M4aL "NMOS PWR ME7170" 8DFN4.9X5.8 9.15,17.575 r270 top locked
M4bH "NMOS PWR ME7170" 8DFN4.9X5.8 13,8.55 r180 bottom
M4bL "NMOS PWR ME7170" 8DFN4.9X5.8 13,8.55 r0 top locked
M4cH "NMOS PWR ME7170" 8DFN4.9X5.8 13,2.85 r180 bottom
M4cL "NMOS PWR ME7170" 8DFN4.9X5.8 13,2.85 r0 top locked
NC "PAD.04" PAD.04X.04#1 3.929,21.7 r180 bottom
P1a "PAD.04" PAD3.2x3.2 -18.9,-11.25 r180 top locked
P1b "PAD.04" PAD3.2x3.2 -18.9,-6.75 r180 top locked
P1c "PAD.04" PAD3.2x3.2 -18.9,-2.25 r180 top locked
P2a "PAD.04" PAD3.2x3.2 -18.9,11.25 r180 top locked
P2b "PAD.04" PAD3.2x3.2 -18.9,6.75 r180 top locked
P2c "PAD.04" PAD3.2x3.2 -18.9,2.25 r180 top locked
P3a "PAD.04" PAD3.2x3.2 18.9,-11.25 r0 top locked
P3b "PAD.04" PAD3.2x3.2 18.9,-6.75 r0 top locked
P3c "PAD.04" PAD3.2x3.2 18.9,-2.25 r0 top locked
P4a "PAD.04" PAD3.2x3.2 18.9,11.25 r0 top locked
P4b "PAD.04" PAD3.2x3.2 18.9,6.75 r0 top locked
P4c "PAD.04" PAD3.2x3.2 18.9,2.25 r0 top locked
R000 "RES2512_1m" 2512-RES 2.1,-16 r270 bottom value=1m
R00 "RES2512_1m" 2512-RES -2.1,-16 r270 bottom value=1m
R0 "RES0402_90k9" 0402-RES -2.7,9.9 r0 bottom value=90.9k
R1 "RES0402_220" 0402-RES -1.5,16.1 r90 top value=220
R01 "RES0402_10k" 0402-RES -3.9,4.4 r90 bottom value=10k
R2 "RES0402_220" 0402-RES -0.5,16.1 r90 top value=220
R02 "RES0402_90k9" 0402-RES -2.6,4.9 r0 bottom value=90.9k
R3 "RES0402_220" 0402-RES 0.5,16.1 r90 top value=220
R03 "RES0402_22" 0402-RES 4.6,16.1 r90 top value=22
R4 "RES0402_220" 0402-RES 1.5,16.1 r90 top value=220
R04 "RES0402_22" 0402-RES 3.5,16.1 r90 top value=22
R20 "RES0402_10k" 0402-RES -2.9,-12.8 r180 top value=10k
R21 "RES0402_22" 0402-RES -6.5,-6.7 r270 top value=22
R22 "RES0402_22" 0402-RES -6.6,-1.008 r90 top value=22
R23 "RES0402_22" 0402-RES -6.6,-2.8 r90 top value=22
R24 "RES0402_22" 0402-RES -4.8,-1 r90 top value=22
R25 "RES0402_10k" 0402-RES -5.7,-1 r270 top value=10k
R26 "RES0402_22" 0402-RES -3.9,-1.008 r90 top value=22
R27 "RES0402_10k" 0402-RES -1.2,-1 r270 top value=10k
R28 "RES0402_22" 0402-RES -3,-1.008 r90 top value=22
R29 "RES0402_10k" 0402-RES -2.1,-1 r270 top value=10k
R30 "RES0402_10k" 0402-RES -8.6,-12.2 r90 top value=10k
R31 "RES0402_3k3" 0402-RES -6.8,-12.2 r90 top value=3k3
R32 "RES0402_1k" 0402-RES -7.7,-12.2 r90 top value=1k
R33 "RES0402_10k" 0402-RES -8.6,-10.4 r270 top value=10k
R34 "RES0402_3k3" 0402-RES -6.8,-10.4 r270 top value=3k3
R35 "RES0402_1k" 0402-RES -7.7,-10.4 r270 top value=1k
R36 "RES0402_10k" 0402-RES -8.6,-8.6 r90 top value=10k
R37 "RES0402_3k3" 0402-RES -6.8,-8.6 r90 top value=3k3
R38 "RES0402_1k" 0402-RES -7.7,-8.6 r90 top value=1k
R40 "RES0402_10k" 0402-RES -2.9,1.1 r180 top value=10k
R41 "RES0402_22" 0402-RES -6.2,7.1 r180 top value=22
R42 "RES0402_22" 0402-RES -6.3,13.6 r90 top value=22
R43 "RES0402_22" 0402-RES -6,11.7 r180 top value=22
R44 "RES0402_22" 0402-RES -4.5,13.6 r90 top value=22
R45 "RES0402_10k" 0402-RES -5.4,13.6 r270 top value=10k
R46 "RES0402_22" 0402-RES -3.6,13.6 r90 top value=22
R47 "RES0402_10k" 0402-RES -0.9,13.6 r270 top value=10k
R48 "RES0402_22" 0402-RES -2.7,13.6 r90 top value=22
R49 "RES0402_10k" 0402-RES -1.8,13.6 r270 top value=10k
R50 "RES0402_10k" 0402-RES -8.8,1.7 r90 top value=10k
R51 "RES0402_3k3" 0402-RES -7,1.692 r90 top value=3k3
R52 "RES0402_1k" 0402-RES -7.9,1.7 r90 top value=1k
R53 "RES0402_10k" 0402-RES -8.8,3.5 r270 top value=10k
R54 "RES0402_3k3" 0402-RES -7,3.5 r270 top value=3k3
R55 "RES0402_1k" 0402-RES -7.9,3.5 r270 top value=1k
R56 "RES0402_10k" 0402-RES -8.8,5.3 r90 top value=10k
R57 "RES0402_3k3" 0402-RES -7,5.3 r90 top value=3k3
R58 "RES0402_1k" 0402-RES -7.9,5.3 r90 top value=1k
R60 "RES0402_10k" 0402-RES 2.9,-0.9 r0 top value=10k
R61 "RES0402_22" 0402-RES 6.3,-6.8 r90 top value=22
R62 "RES0402_22" 0402-RES 6.6,-12.9 r270 top value=22
R63 "RES0402_22" 0402-RES 6.3,-11.3 r0 top value=22
R64 "RES0402_22" 0402-RES 4.8,-12.9 r270 top value=22
R65 "RES0402_10k" 0402-RES 5.7,-12.9 r90 top value=10k
R66 "RES0402_22" 0402-RES 3.9,-12.9 r270 top value=22
R67 "RES0402_10k" 0402-RES 1.2,-12.9 r90 top value=10k
R68 "RES0402_22" 0402-RES 3,-12.9 r270 top value=22
R69 "RES0402_10k" 0402-RES 2.1,-12.9 r90 top value=10k
R70 "RES0402_10k" 0402-RES 8.85,-1.3 r270 top value=10k
R71 "RES0402_3k3" 0402-RES 7.05,-1.3 r270 top value=3k3
R72 "RES0402_1k" 0402-RES 7.95,-1.3 r270 top value=1k
R73 "RES0402_10k" 0402-RES 8.85,-3.1 r90 top value=10k
R74 "RES0402_3k3" 0402-RES 7.05,-3.1 r90 top value=3k3
R75 "RES0402_1k" 0402-RES 7.95,-3.1 r90 top value=1k
R76 "RES0402_10k" 0402-RES 8.7,-4.9 r270 top value=10k
R77 "RES0402_3k3" 0402-RES 6.8,-4.9 r270 top value=3k3
R78 "RES0402_1k" 0402-RES 7.8,-4.9 r270 top value=1k
R80 "RES0402_10k" 0402-RES 2.85,13.55 r0 top value=10k
R81 "RES0402_22" 0402-RES 7,7.35 r90 top value=22
R82 "RES0402_22" 0402-RES 6.6,1.4 r270 top value=22
R83 "RES0402_22" 0402-RES 6.7,3 r0 top value=22
R84 "RES0402_22" 0402-RES 4.8,1.408 r270 top value=22
R85 "RES0402_10k" 0402-RES 5.7,1.4 r90 top value=10k
R86 "RES0402_22" 0402-RES 3.9,1.408 r270 top value=22
R87 "RES0402_10k" 0402-RES 1.2,1.4 r90 top value=10k
R88 "RES0402_22" 0402-RES 3,1.408 r270 top value=22
R89 "RES0402_10k" 0402-RES 2.1,1.4 r90 top value=10k
R90 "RES0402_10k" 0402-RES 8.8,13 r270 top value=10k
R91 "RES0402_3k3" 0402-RES 7,12.9 r270 top value=3k3
R92 "RES0402_1k" 0402-RES 7.9,13 r270 top value=1k
R93 "RES0402_10k" 0402-RES 8.9,11.1 r90 top value=10k
R94 "RES0402_3k3" 0402-RES 7,11 r90 top value=3k3
R95 "RES0402_1k" 0402-RES 7.9,11.2 r90 top value=1k
R96 "RES0402_10k" 0402-RES 8.8,9.2 r270 top value=10k
R97 "RES0402_3k3" 0402-RES 7,9.2 r270 top value=3k3
R98 "RES0402_1k" 0402-RES 7.9,9.2 r270 top value=1k
U0 "IC PWR AMS1117-3.3 SOT89-3" SOT89-3 0,1.5 r0 bottom
U1 "IC PWR JW5026 SOT23-6" SOT23-6 -2.2,7.5 r90 bottom
U2 "IC PWR INA199C1DCKR SC70-6" SC70-6 0,-16.5 r270 top
U11 "IC MCU EFM8BB21F16G-C 20QFN" QFN20_3X3_SIL -3.6,-10.176 r90 top
U12 "IC MOSDRV FD6288Q 24QFN" QFN-24(4x4) -3.3,-4.7 r180 top
U21 "IC MCU EFM8BB21F16G-C 20QFN" QFN20_3X3_SIL -3.6,3.85 r90 top
U22 "IC MOSDRV FD6288Q 24QFN" QFN-24(4x4) -3.3,9.7 r180 top
U31 "IC MCU EFM8BB21F16G-C 20QFN" QFN20_3X3_SIL 3.6,-3.4 r270 top
U32 "IC MOSDRV FD6288Q 24QFN" QFN-24(4x4) 3.3,-9.15 r0 top
U41 "IC MCU EFM8BB21F16G-C 20QFN" QFN20_3X3_SIL 3.6,10.8 r270 top
U42 "IC MOSDRV FD6288Q 24QFN" QFN-24(4x4) 3.3,5.1 r0 top
VCC "PAD.04" PAD.04X.04#1 -3.929,21.7 r90 bottom

## Footprints (in the part's own frame and the unit in brackets; to place one, negate y for a bottom-side part, rotate by r counter-clockwise, add the part's x,y. Pads: shape width x height; smd on the part's side, far side on the other; paste and mask are expansions set on the pad)
00FTECH [mm]
  silkscreen extent -0.72,-0.36 0.5,0.31
8DFN4.9X5.8 [mil]
  rect 38x18 smd paste+0 mask+0: 1(-114,75) 2(-114,25) 3(-114,-25) 4(-114,-75) 5(114,-75) 6(114,-25) 7(114,25) 8(114,75)
  Top Layer region: 96,-87.5 96,87.5 -52,87.5 -52,-87.5
  body extent -119,-108 119,108, height 37
0402-CAP [mil]
  rrect50% 20x24 smd mask+0: P$1(-15.75,0) P$2(15.75,0)
  body extent -20,-10 20,10, height 20
0402-RES [mil] "0402-RES"
  rect 20x24 smd: P$1(-19.69,0) P$2(20,0)
  body extent -20,-10 20,10, height 20
0603-CAP [mil] "0603-CAP"
  rrect50% 24x36 smd mask+0: P$1(-27.56,0) P$2(27.56,0)
  silkscreen extent 0,-2 0,2, body extent -31,-16 31,16, height 34
1206-CAP [mil]
  rect 36x63 smd: P$1(-57.09,0) P$2(58,0)
  silkscreen extent 0,0 0,1, body extent -63,-31 63,31, height 34
1210-IND [mm]
  rect 1x2.5 smd paste+0 mask+0: 1(-1.4,0) 2(1.4,0)
  body extent -1.08,-0.88 1.08,0.88, height 0.99
2512-RES [mm]
  rect 3.05x3.68 smd paste+0 mask+0: P$1(-2.16,0) P$2(2.16,0)
  body extent -3.23,-1.68 3.23,1.68, height 0.66
JST_SM08B-SRSS-TB [mm]
  rect 0.6x1.55 smd: 1(-3.5,4.775) 2(-2.5,4.775) 3(-1.5,4.775) 4(-0.5,4.775) 5(0.5,4.775) 6(1.5,4.775) 7(2.5,4.775) 8(3.5,4.775)
  rect 1.2x1.8 smd: P1(-4.8,0.9) P2(4.8,0.9)
  silkscreen extent -4.52,4.98 -4.28,5.22, body extent -5,0.3 5,5.25, height 2.95
PAD3.2x3.2 [mm]
  round 0.45 hole 0.3: P$1(-1.2,1.2) P$1(-1.2,-0.6) P$1(-1.2,0) P$1(-1.2,0.6) P$1(-1.2,-1.2) P$1(-0.5,1.2) P$1(-0.5,0.6) P$1(-0.5,0) P$1(-0.5,-0.6) P$1(-0.5,-1.2) P$1(0.2,1.2) P$1(0.2,0.6) P$1(0.2,0) P$1(0.2,-0.6) P$1(0.2,-1.2) P$1(0.9,1.2) P$1(0.9,-1.2)
  rect 3.2x3.2 smd paste-2: P$1(0,0)
  rect 3.2x3.2 smd far side paste-2: P$1(0,0)
  round 1.7 hole 1.4: P$1(1.6,0)
PAD6x8 [mm]
  round 0.45 hole 0.3: P$1(-1.7,3.616) P$1(-1.7,1.816) P$1(-1.7,2.716) P$1(-1.7,-0.884) P$1(-1.7,0.016) P$1(-1.7,0.916) P$1(-1.7,-2.684) P$1(-1.7,-1.784) P$1(-1.7,-3.584) P$1(-0.8,3.616) P$1(-0.8,2.716) P$1(-0.8,1.816) P$1(-0.8,0.916) P$1(-0.8,0.016) P$1(-0.8,-0.884) P$1(-0.8,-1.784) P$1(-0.8,-2.684) P$1(-0.8,-3.584) P$1(0.1,3.616) P$1(0.1,2.716) P$1(0.1,1.816) P$1(0.1,0.916) P$1(0.1,0.016) P$1(0.1,-0.884) P$1(0.1,-1.784) P$1(0.1,-2.684) P$1(0.1,-3.584) P$1(0.7,2.716) P$1(1,3.616) P$1(1,1.816) P$1(1,0.916) P$1(1,0.016) P$1(1,-0.884) P$1(1,-1.784) P$1(1,-2.684) P$1(1,-3.584) P$1(1.8,1.616) P$1(1.8,0.916) P$1(1.8,-2.684) P$1(1.8,-3.584) P$1(2.6,3.616) P$1(2.6,1.816) P$1(2.6,-2.684) P$1(2.6,-3.584) P$2(-1.7,13.285) P$2(-1.7,14.185) P$2(-1.7,11.485) P$2(-1.7,12.385) P$2(-1.7,9.685) P$2(-1.7,10.585) P$2(-1.7,6.985) P$2(-1.7,7.885) P$2(-1.7,8.785) P$2(-0.8,14.185) P$2(-0.8,13.285) P$2(-0.8,12.385) P$2(-0.8,11.485) P$2(-0.8,10.585) P$2(-0.8,9.685) P$2(-0.8,8.785) P$2(-0.8,7.885) P$2(-0.8,6.985) P$2(0.1,14.185) P$2(0.1,13.285) P$2(0.1,12.385) P$2(0.1,11.485) P$2(0.1,10.585) P$2(0.1,9.685) P$2(0.1,8.785) P$2(0.1,7.885) P$2(0.1,6.985) P$2(0.7,7.885) P$2(1,13.285) P$2(1,14.185) P$2(1,12.385) P$2(1,11.485) P$2(1,10.585) P$2(1,9.685) P$2(1,8.785) P$2(1,6.985) P$2(1.8,13.285) P$2(1.8,14.185) P$2(1.8,8.985) P$2(1.8,9.685) P$2(2.6,13.285) P$2(2.6,14.185) P$2(2.6,6.985) P$2(2.6,8.785)
  rect 5x8 smd paste-2: P$1(0.5,0) P$2(0.5,10.6)
  rect 5x8 smd far side paste-2: P$1(0.5,0) P$2(0.5,10.6)
  round 1.3 hole 1: P$1(1.8,2.716) P$2(1.8,7.885)
  round 2.4 hole 2: P$1(3,-0.784) P$2(3,11.385)
PAD.04X.04#1 [mil]
  rrect50% 40x40 smd paste-78.74: P$1(0,0)
PAD.04X.04#2 [mil]
  rrect50% 40x40 smd paste-78.74: P$1(15.75,-31.5)
PAD.04X.04#3 [mil]
  rrect50% 40x40 smd paste-78.74: P$1(15.75,0)
QFN20_3X3_SIL [mil]
  rect 12x12 smd paste+0 mask+0: 1(-49.21,49.21) 6(-49.21,-49.21) 11(49.21,-49.21) 16(49.21,49.21)
  rect 35x12 smd paste+0 mask+0: 2(-61.02,29.53) 3(-61.02,9.84) 4(-61.02,-9.84) 5(-61.02,-29.53) 12(61.02,-29.53) 13(61.02,-9.84) 14(61.02,9.84) 15(61.02,29.53)
  rect 12x35 smd paste+0 mask+0: 7(-29.53,-61.02) 8(-9.84,-61.02) 9(9.84,-61.02) 10(29.53,-61.02) 17(29.53,61.02) 18(9.84,61.02) 19(-9.84,61.02) 20(-29.53,61.02)
  rect 71x71 smd paste+0 mask+0: 21(0,0)
  silkscreen extent -80,73 -72,81, body extent -59,-59 59,59, height 31
QFN-24(4x4) [mm] "QFN-24"
  rect 0.813x0.305 smd mask+0: 1(-2,1.25) 2(-2,0.75) 3(-2,0.25) 4(-2,-0.25) 5(-2,-0.75) 6(-2,-1.25) 13(2,-1.25) 14(2,-0.75) 15(2,-0.25) 16(2,0.25) 17(2,0.75) 18(2,1.25)
  rect 0.305x0.813 smd mask+0: 7(-1.25,-2) 8(-0.75,-2) 9(-0.25,-2) 10(0.25,-2) 11(0.75,-2) 12(1.25,-2) 19(1.25,2) 20(0.75,2) 21(0.25,2) 22(-0.25,2) 23(-0.75,2) 24(-1.25,2)
  silkscreen extent -2.13,1.87 -1.87,2.13, body extent -2,-2 2,2, height 0.9
SC70-6 [mm]
  rect 0.85x0.4 smd paste+0 mask+0.051: 1(-1.125,0.65) 2(-1.125,0) 3(-1.125,-0.65) 4(1.125,-0.65) 5(1.125,0) 6(1.125,0.65)
  silkscreen extent -0.92,1.26 -0.81,1.38, body extent -1.05,-1 1.05,1, height 1
SMC-TVS [mm] "0402-TVS"
  rect 2.4x3.3 smd: A(3.3,0) C(-3.3,0)
  silkscreen extent -0.19,-0.5 0.08,0.5, body extent -4.06,-3.11 4.06,3.11, height 2.67
SOD-523_0P9X1P3 [mil]
  rect 20x14 smd paste+0 mask+0: A(31.5,0) K(-31.5,0)
  silkscreen extent -37,14 -31,20, body extent -34,-17 34,17, height 18
SOT23-6 [mil]
  rect 38.5x22 smd paste+0 mask+0: 1(-53.75,37.4) 2(-53.75,0) 3(-53.75,-37.4) 4(53.75,-37.4) 5(53.75,0) 6(53.75,37.4)
  silkscreen extent -51,70 -49,72, body extent -59,-59 59,59, height 57
SOT89-3 [mm]
  rect 1x1.5 smd: 1(-1.5,-2) 3(1.5,-2)
  rect 1x1.5 smd paste-2 mask+0: 2(0,-2)
  Top Layer region: 1.1,1.9 1.1,-0.35 0.5,-0.95 0.5,-2.75 -0.5,-2.75 -0.5,-0.95 -1.1,-0.35 -1.1,1.9 -0.5,2.5 0.5,2.5
  body extent -2.25,-2.05 2.25,2.05, height 1.6

## Part data
3v CD1 CD2 CD3 CD4 CH1 CH2 CH3 CH4 CK1 CK2 CK3 CK4 CURR gnd GNDd NC VCC: library part "X PADS.04"
C00 C01: "50V 100nF X7R ±10% 0402 Multilayer Ceramic Capacitors MLCC - SMD/SMT ROHS", Digikey Part Number=490-10700-1-ND, LSCS Part Number=C77020, Manufacturer Product Number=GRM155R71H104KE14D, Package=0402, Voltage Rating=50
C1 C2 C3 C4 C5 C6 C7 C8 C9 C10 C16 C17 C18 C19 C26 C27 C28 C29 C30 C36 C37 C38 C39 C40 C46 C47 C48 C50 C60: "CAP CER 22UF 35V 20% X5R 1206", Digikey Part Number=445-8045-1-ND, LSCS Part Number=C342620, Manufacturer Product Number=C3216X5R1V226M160AC, Package=1206, Voltage Rating=35
C02: "35V 4.7uF X5R ±10% 0603 Multilayer Ceramic Capacitors MLCC - SMD/SMT ROHS", Digikey Part Number=490-7205-1-ND, LSCS Part Number=C162274, Manufacturer Product Number=GRM188R6YA475KE15D, Package=0603, Voltage Rating=35V
C03: "10V 10uF X5R ±20% 0402 Multilayer Ceramic Capacitors MLCC - SMD/SMT ROHS", Digikey Part Number=N/A, LSCS Part Number=C77000, Manufacturer Product Number=GRM155R61A106ME44D, Package=0402, Voltage Rating=10V
C04 C11 C12 C21 C22 C31 C32 C41 C42: "X7R 100nF 16V ±10% 0402 Multilayer Ceramic Capacitors MLCC - SMD/SMT ROHS", Digikey Part Number=1276-1507-1-ND, LSCS Part Number=C1525, Manufacturer Product Number=CL05B104KO3LNNC, Package=0402, Voltage Rating=16
C05: "50V 1nF X7R ±10% 0402 Multilayer Ceramic Capacitors MLCC - SMD/SMT ROHS", Digikey Part Number=311-1036-1-ND, LSCS Part Number=C106205, Manufacturer Product Number=CC0402KRX7R9BB102, Package=0402, Voltage Rating=50
C13 C14 C15 C23 C24 C25 C33 C34 C35 C43 C44 C45: "X5R 1uF 16V ±10% 0402 Multilayer Ceramic Capacitors MLCC - SMD/SMT ROHS", Digikey Part Number=1276-1067-1-ND, LSCS Part Number=C29266, Manufacturer Product Number=CL05A105KO5NNNC, Package=0402, Voltage Rating=16V
D00: "66.1A 45.4V 3kW 31.1V 28V SMC ESD and Surge Protection (TVS/ESD) ROHS", Digikey Part Number=SMDJ28CACT-ND, LSCS Part Number=C2990249, Manufacturer Product Number=SMDJ28CA, Package="SMC, DO214AB"
D13 D14 D15 D23 D24 D25 D33 D34 D35 D43 D44 D45: "75V Independent Type 1.25V@150mA 4ns 150mA SOD-523 Switching Diodes ROHS", Digikey Part Number=1N4148WTCT-ND, LSCS Part Number=C917006, Manufacturer Product Number=1N4148WT, Package=SOD523
J0: "SH Series 8 Position 1 mm Pitch Surface Mount Side Entry Shrouded Header Right Angle / CONN HEADER SMD R/A 8POS 1MM", Digikey Part Number=455-1808-1-ND, LSCS Part Number=C2763618, Manufacturer Product Number=SM08B-SRSS-TB
L00: "1.6A 6.8uH ±20% 1.8A 220mΩ 1210 Inductors (SMD) ROHS", Digikey Part Number=445-TFM322512ALMA6R8MTAACT-ND, LSCS Part Number=C2047644, Manufacturer Product Number=TFM322512ALMA6R8MTAA, Package=1210
M1aH M1aL M1bH M1bL M1cH M1cL M2aH M2aL M2bH M2bL M2cH M2cL M3aH M3aL M3bH M3bL M3cH M3cL M4aH M4aL M4bH M4bL M4cH M4cL: "30V 90A NMOS 3.9mΩ@4.5V,19A 36W 2.2V DFN-8(4.9x5.8) MOSFETs ROHS", Digikey Part Number=N/A, LSCS Part Number=C2841360, Manufacturer Product Number=ME7170, Package=8DFN(4.9x5.8)
P1a P1b P1c P2a P2b P2c P3a P3b P3c P4a P4b P4c: library part "X PAD.ESC"
R000 R00: "2W 1mΩ Current Sensing Resistors ±50ppm/℃ ±1% 2512 Current Sense Resistors / Shunt Resistors ROHS", Digikey Part Number=YAG6089CT-ND, LSCS Part Number=C326570, Manufacturer Product Number=PA2512FKE7W0R001E, Package=2512
R0 R02: "62.5mW Thick Film Resistors 50V ±100ppm/℃ ±1% 90.9kΩ 0402 Chip Resistor - Surface Mount ROHS", Digikey Part Number=311-90.9KLRCT-ND, LSCS Part Number=C163452, Manufacturer Product Number=RC0402FR-0790K9L, Package=0402
R1 R2 R3 R4: "62.5mW Thick Film Resistors 50V ±100ppm/℃ ±1% 220Ω 0402 Chip Resistor - Surface Mount ROHS", Digikey Part Number=311-220LRCT-ND, LSCS Part Number=C112291, Manufacturer Product Number=RC0402FR-07220RL, Package=0402
R01 R20 R25 R27 R29 R30 R33 R36 R40 R45 R47 R49 R50 R53 R56 R60 R65 R67 R69 R70 R73 R76 R80 R85 R87 R89 R90 R93 R96: "50V Thick Film Resistors 62.5mW 110kΩ ±1% ±100ppm/℃ 0402 Chip Resistor - Surface Mount ROHS", Digikey Part Number=311-10.0KLRCT-ND, LSCS Part Number=C60490, Manufacturer Product Number=RC0402FR-0710KL, Package=0402
R03 R04 R21 R22 R23 R24 R26 R28 R41 R42 R43 R44 R46 R48 R61 R62 R63 R64 R66 R68 R81 R82 R83 R84 R86 R88: "62.5mW Thick Film Resistors 50V ±1% ±100ppm/℃ 22Ω 0402 Chip Resistor - Surface Mount ROHS", Digikey Part Number=311-22.0LRCT-ND, LSCS Part Number=C114765, Manufacturer Product Number=RC0402FR-0722RL, Package=0402
R31 R34 R37 R51 R54 R57 R71 R74 R77 R91 R94 R97: "62.5mW Thick Film Resistors 50V ±100ppm/℃ ±1% 3.3kΩ 0402 Chip Resistor - Surface Mount ROHS", Digikey Part Number=1712-CRG0402F3K3CT-ND, LSCS Part Number=C137992, Manufacturer Product Number=RC0402FR-073K3L, Package=0402
R32 R35 R38 R52 R55 R58 R72 R75 R78 R92 R95 R98: "62.5mW Thick Film Resistors 50V ±100ppm/℃ ±1% 1kΩ 0402 Chip Resistor - Surface Mount ROHS", Digikey Part Number=311-1.0KJRCT-ND, LSCS Part Number=C105637, Manufacturer Product Number=RC0402JR-071KL, Package=0402
U0: "IC LDO REG 3.3V 1A 15Vinmax SOT89-3", Digikey Part Number=5272-AMS1117-3.3SCT-ND, LSCS Part Number=C22472154, Manufacturer Product Number=AMS1117-3.3, Output Current=1A, Output Voltage=3.3V, Package=SOT89-3, Voltage Rating=15V
U1: "Step-down type 1A 4.7V~40V SOT-23-6 DC-DC Converters ROHS", Digikey Part Number=N/A, LSCS Part Number=C185109, Manufacturer Product Number=JW5026, Package=SOT23-6
U2: "Current Sense Regulator High/Low-Side SC-70-6", Digikey Part Number=296-47775-1-ND, LSCS Part Number=C2155860, Manufacturer Product Number=INA199C1DCKR, Package=SC70-6
U11 U21 U31 U41: "IC MCU 8BIT 16KB FLASH 20QFN", Digikey Part Number=336-4743-1-ND, LSCS Part Number=C80713, Manufacturer Product Number=EFM8BB21F16G-C-QFN20R, Package=20QFN
U12 U22 U32 U42: "High and low sides MOSFET 1.8A 8V~20V 1.5A QFN-24 Gate Drivers ROHS", Digikey Part Number=N/A, LSCS Part Number=C328453, Manufacturer Product Number=FD6288Q, Package=24QFN(4x4)

## Via types
v1: diameter 0.45, hole 0.2, Top Layer to Bottom Layer, 202 vias
v2: diameter 0.45, hole 0.3, Top Layer to Bottom Layer, 4 vias
v3: diameter 4.572, hole 3.975, Top Layer to Bottom Layer, 4 vias

## Nets (pads, with @x,y where several pads share a name; then routed paths per layer and width w, separated by ;. In a path a pad name is that pad's centre, name@x,y a point inside that pad or via, vN(x,y) a via of type N, cw(c..) or ccw(c..) an arc to the next point about the centre after c; other vN are vias at no path point)
+3V3: 3v.P$1 C04.P$1 C11.P$1 C21.P$1 C31.P$1 C41.P$1 R20.P$2 R40.P$2 R60.P$2 R80.P$2 U0.2 U2.3 U11.4 U21.4 U31.4 U41.4 | length 12
  Top Layer w0.254: C11.P$1@-4.2,1 -4.15,1.05 v1(-3.417,1.05) -3.367,1.1 -3.367,2.283 U21.4@-3.35,2.3 ; v1(-3.9,-15.793) -3.441,-15.335 -3.441,-14.595 -3.408,-14.561 R20.P$2@-3.408,-12.8 ; R20.P$2@-3.35,-12.661 U11.4@-3.35,-11.65 ; C04.P$1@-1.6,-15.2 -0.965,-15.2 -0.688,-15.478 -0.688,-15.756 v1(-0.65,-15.793) ; v1(-0.1,0.8) -0.062,0.762 -0.062,0.062 v1(0,0) ; U31.4@3.35,-1.85 3.367,-1.833 3.367,-0.941 R60.P$2@3.408,-0.9 3.408,-0.849 C31.P$1@3.779,-0.478 ; U41.4@3.35,12.35 v1(3.35,13.665) 3.354,13.669 3.354,14.346 C41.P$1@3.35,14.35
  other v1: 4,-0.3
ch1_c2ck: CK1.P$1 R20.P$1 U11.5 | length 2.9
  Top Layer w0.254: U11.5@-2.85,-11.65 -2.85,-12.35 -2.701,-12.499 -2.65,-12.499 -2.4,-12.749 R20.P$1@-2.4,-12.8 -2.4,-12.851 -1.951,-13.3 CK1.P$1@-1.1,-13.3
ch1_c2d: CD1.P$1 U11.6 | length 1.4
  Top Layer w0.254: U11.6@-2.35,-11.426 -1.976,-11.8 CD1.P$1@-1.1,-11.8
ch1_com_all: R31.P$1 R34.P$1 R37.P$1 U11.20 | length 6.5
  Top Layer w0.203: v1(-6.8,-12.8) -6.8,-12.751 -5.5,-11.451 -5.5,-11.2 -5.493,-11.193 U11.20@-5.493,-10.901 ; R34.P$1@-6.8,-9.9 -6.793,-9.893 v1(-6.793,-9.5) ; v1@-6.8,-9.5 R37.P$1@-6.8,-9.1
  Mid Layer 1 w0.203: v1(-6.8,-12.8) -6.8,-9.507 v1(-6.793,-9.5)
ch1_hin1: U11.16 U12.22 | length 5.2
  Top Layer w0.203: v1(-5.4,-8.1) -5.353,-8.147 -5.353,-8.347 U11.16@-4.85,-8.85 ; v1(-3.8,-5.877) -3.753,-5.924 -3.336,-5.924 -3.093,-6.167 -3.093,-6.657 U12.22@-3.05,-6.7
  Mid Layer 2 w0.203: v1(-5.4,-8.1) -5.4,-8.094 -4.5,-7.194 -4.5,-6.577 v1(-3.8,-5.877)
ch1_hin2: U11.14 U12.23 | length 2.7
  Top Layer w0.203: U11.14@-3.85,-8.55 -3.807,-8.507 -3.807,-7.981 -3.297,-7.471 -2.831,-7.471 -2.593,-7.233 -2.593,-6.743 U12.23@-2.55,-6.7
ch1_hin3: U11.11 U12.24 | length 2.5
  Top Layer w0.203: U11.11@-2.35,-8.926 -2.331,-8.907 -2.331,-8.469 -1.916,-8.055 -1.916,-7.545 -2.05,-7.411 U12.24@-2.05,-6.7
ch1_ho1: R21.P$1 U12.19 | length 2.2
  Top Layer w0.203: R21.P$1@-6.5,-6.2 -6.449,-6.2 -5.949,-6.7 -5.575,-6.7 -5.568,-6.694 -4.601,-6.694 -4.594,-6.7 U12.19@-4.55,-6.7
ch1_ho2: R22.P$1 U12.16 | length 5.3
  Top Layer w0.203: R22.P$1@-6.6,-1.508 v1(-6.6,-1.5) ; U12.16@-5.3,-4.95 -5.257,-4.993 -4.694,-4.993 -4.574,-5.112 v1(-4.508,-5.112)
  Mid Layer 1 w0.203: v1(-6.6,-1.5) -4.508,-3.592 v1(-4.508,-5.112)
ch1_ho3: R23.P$1 U12.13 | length 1.4
  Top Layer w0.203: R23.P$1@-6.6,-3.3 -6.501,-3.399 -5.351,-3.399 U12.13@-5.3,-3.45
ch1_in: CH1.P$1 R1.P$1 U11.2 | length 36.5
  Top Layer w0.203: v1(-4.431,-12.1) -4.35,-12.019 U11.2@-4.35,-11.726
  Mid Layer 1 w0.254: v1(-2.3,21.7) -2.3,18.502 -2.021,18.223 -2.021,17.827 -2.3,17.548 -2.3,16.4 v1(-1.5,15.6)
  Mid Layer 2 w0.406: v1(-4.431,-12.1) -0.989,-8.659 -0.989,7.918 -1.061,7.99 -1.061,10.44 -1.004,10.497 -1.004,12.947 -1.245,13.187 -1.245,13.322 -1.5,13.577 v1(-1.5,15.6)
ch1_lin1: U11.15 U12.1 | length 5.1
  Top Layer w0.203: v1(-2.593,-5.865) -2.526,-5.865 -2.441,-5.95 U12.1@-1.3,-5.95
  Top Layer w0.254: v1(-4.7,-8.035) -4.662,-8.073 -4.535,-8.073 -4.35,-8.258 U11.15@-4.35,-8.55
  Mid Layer 2 w0.254: v1(-4.7,-8.035) -4.7,-7.982 -4.602,-7.884 -4.602,-7.875 v1(-2.593,-5.865)
ch1_lin2: U11.13 U12.2 | length 4.9
  Top Layer w0.203: U11.13@-3.35,-8.55 -3.307,-8.507 -3.307,-8.055 -3.129,-7.877 -2.488,-7.877 v1(-2.446,-7.835) ; v1(-2.1,-5.4) -2.075,-5.425 -1.325,-5.425 U12.2@-1.3,-5.45
  Mid Layer 2 w0.203: v1(-2.446,-7.835) -2.446,-6.795 -2.1,-6.449 v1(-2.1,-5.4)
ch1_lin3: U11.10 U12.3 | length 5.8
  Top Layer w0.203: U11.10@-2.05,-9.35 -1.838,-9.35 -1.787,-9.299 -1.787,-8.501 -1.51,-8.223 -1.51,-7.01 -0.907,-6.407 -0.767,-6.407 -0.589,-6.229 -0.589,-5.171 -0.767,-4.993 -1.257,-4.993 U12.3@-1.3,-4.95
ch1_lo1: R24.P$1 U12.11 | length 4.6
  Top Layer w0.203: R24.P$1@-4.8,-1.5 -4.765,-1.535 v1(-4.765,-1.8) ; U12.11@-4.05,-2.7 -4.007,-2.743 -4.007,-3.233 -3.705,-3.535 v1(-2.917,-3.535)
  Mid Layer 1 w0.203: v1(-4.765,-1.8) -4.708,-1.8 -2.973,-3.535 v1(-2.917,-3.535)
ch1_lo2: R26.P$1 U12.10 | length 1.4
  Top Layer w0.203: R26.P$1@-3.9,-1.508 -3.849,-1.508 -3.697,-1.66 -3.697,-1.842 -3.55,-1.989 U12.10@-3.55,-2.7
ch1_lo3: R28.P$1 U12.9 | length 1.2
  Top Layer w0.203: U12.9@-3.05,-2.7 -3.05,-1.558 R28.P$1@-3,-1.508
ch1_mux1: R30.P$2 R31.P$2 R32.P$2 U11.19 | length 4.3
  Top Layer w0.203: R30.P$2@-8.6,-11.692 R32.P$2@-7.7,-11.692 R31.P$2@-6.8,-11.692 -6.394,-11.692 -6.03,-11.328 -6.03,-10.981 -5.899,-10.85 -5.899,-10.571 -5.721,-10.393 U11.19@-5.193,-10.393
ch1_mux2: R33.P$2 R34.P$2 R35.P$2 U11.18 | length 4
  Top Layer w0.203: R33.P$2@-8.6,-10.908 R35.P$2@-7.7,-10.908 R34.P$2@-6.8,-10.908 -6.648,-10.756 -6.425,-10.756 -6.306,-10.637 -6.306,-10.403 -5.795,-9.893 U11.18@-5.193,-9.893
ch1_mux3: R36.P$2 R37.P$2 R38.P$2 U11.17 | length 3.8
  Top Layer w0.203: R36.P$2@-8.4,-8.092 -7.5,-8.092 -6.618,-8.092 -5.493,-9.217 -5.493,-9.299 -5.442,-9.35 U11.17@-5.15,-9.35
ch1_vb1: C13.P$1 D13.K U12.20 | length 5.4
  Top Layer w0.203: D13.K@-8.5,-7.1 v1(-7.8,-7.1) ; v1(-5.4,-7.23) -5.333,-7.23 -5.152,-7.411 -4.271,-7.411 -4.093,-7.233 -4.093,-6.743 U12.20@-4.05,-6.7
  Mid Layer 2 w0.203: v1(-7.8,-7.1) -7.733,-7.1 -7.48,-6.846 -5.783,-6.846 v1(-5.4,-7.23)
ch1_vb2: C14.P$1 D14.K U12.17 | length 3.6
  Top Layer w0.203: D14.K@-8.5,-4.7 -8.5,-4.776 -8.424,-4.852 -8.057,-4.852 -7.51,-5.4 C14.P$1@-6.9,-5.4 -6.875,-5.425 -5.325,-5.425 U12.17@-5.3,-5.45
ch1_vb3: C15.P$1 D15.K U12.14 | length 4.5
  Top Layer w0.203: D15.K@-8.5,-2.3 C15.P$1@-7.5,-2.3 -7.5,-3.39 -6.94,-3.95 U12.14@-5.3,-3.95
ch2_c2ck: CK2.P$1 R40.P$1 U21.5 | length 3.3
  Top Layer w0.254: U21.5@-2.85,2.3 -2.85,1.55 -2.578,1.278 -2.527,1.278 -2.4,1.151 R40.P$1@-2.4,1.1 -1.6,1.1 CK2.P$1@-0.8,1.9
ch2_c2d: CD2.P$1 U21.6 | length 1.8
  Top Layer w0.254: U21.6@-2.35,2.6 -1.469,2.6 -0.869,3.2 CD2.P$1@-0.8,3.2
ch2_com_all: R51.P$1 R54.P$1 R57.P$1 U21.20 | length 6.9
  Top Layer w0.254: v1(-7,1.192) -6.949,1.192 -5.788,2.354 -5.788,2.755 -5.442,3.1 U21.20@-5.15,3.1 ; R54.P$1@-7,4 v1(-7,4.4) R57.P$1@-7,4.8
  Mid Layer 1 w0.254: v1(-7,1.192) v1(-7,4.4)
ch2_hin1: U21.16 U22.22 | length 3.9
  Top Layer w0.203: U21.16@-4.85,5.1 -4.85,6.328 -4.83,6.348 -4.83,6.419 -4.519,6.73 -4.448,6.73 -4.189,6.989 -3.271,6.989 -3.093,7.167 -3.093,7.657 U22.22@-3.05,7.7
ch2_hin2: U21.14 U22.23 | length 3.2
  Top Layer w0.203: U21.14@-3.85,5.4 -3.807,5.443 -3.807,5.971 -3.77,6.008 -3.77,6.408 -3.596,6.582 -2.937,6.582 -2.55,6.969 U22.23@-2.55,7.7
ch2_hin3: U21.11 U22.24 | length 4.2
  Top Layer w0.203: U21.11@-2.35,5.1 -2.299,5.151 -2,5.151 -1.57,5.581 -1.57,6.277 -1.015,6.832 -1.015,7.271 -1.325,7.581 -1.999,7.581 -2.05,7.632 U22.24@-2.05,7.7
ch2_ho1: R41.P$1 U22.19 | length 1.5
  Top Layer w0.254: R41.P$1@-5.7,7.1 -4.896,7.1 -4.55,7.446 U22.19@-4.55,7.7
ch2_ho2: R42.P$1 U22.16 | length 5.2
  Top Layer w0.254: v1(-6.514,12.934) -6.466,12.934 R42.P$1@-6.3,13.1 ; v1(-6.512,9.505) -6.459,9.505 -6.404,9.45 U22.16@-5.3,9.45
  Mid Layer 1 w0.254: v1(-6.514,12.934) -6.476,12.897 -6.476,12.336 -6.221,12.08 -6.221,11.602 -6.465,11.357 v1@-6.465,9.505 ; v1(-6.512,9.505) v1@-6.489,9.482
ch2_ho3: R43.P$1 U22.13 | length 0.8
  Top Layer w0.254: R43.P$1@-5.5,11.7 -5.5,11.649 -5.3,11.449 U22.13@-5.3,10.95
ch2_in: CH2.P$1 R2.P$1 U21.2 | length 22.8
  Top Layer w0.254: v1(-4.625,1.675) -4.588,1.712 -4.588,1.77 -4.35,2.008 U21.2@-4.35,2.3
  Mid Layer 1 w0.254: v1(-0.8,21.7) -0.8,21.647 -0.5,21.347 v1(-0.5,15.5)
  Mid Layer 1 w0.406: v1(-4.625,1.675) -4.625,3.943 -4.855,4.173 -4.855,8.87 -4.905,8.92 -4.905,9.38 -4.855,9.43 -4.855,9.978 -2.331,12.501 -2.331,12.838 -2.355,12.862 -2.355,13.645 v1(-0.5,15.5)
ch2_lin1: U21.15 U22.1 | length 9.6
  Top Layer w0.203: U21.15@-4.35,5.4 -4.325,5.425 -4.325,6.175 v1(-4.3,6.2)
  Top Layer w0.254: v1(-2.763,10.592) -2.763,10.539 -2.859,10.442 -2.859,10.403 -3.214,10.049 -3.214,9.838 -1.843,8.467 -1.317,8.467 U22.1@-1.3,8.45
  Mid Layer 1 w0.203: v1(-4.3,6.2) -3.896,6.604 -3.896,10.06 -3.777,10.179 -3.175,10.179 v1(-2.763,10.592)
ch2_lin2: U21.13 U22.2 | length 5.9
  Top Layer w0.203: U21.13@-3.35,5.4 -3.307,5.443 -3.307,5.971 -3.102,6.176 -2.473,6.176 -2.319,6.33 -2.266,6.33 v1(-1.544,7.052)
  Top Layer w0.254: U22.2@-1.3,8.95 -1.283,8.933 -0.707,8.933 -0.559,8.784 v1(-0.506,8.784)
  Mid Layer 1 w0.203: v1(-1.544,7.052) -1.544,7.906 -1.129,8.321 -0.969,8.321 v1(-0.506,8.784)
ch2_lin3: U21.10 U22.3 | length 7
  Top Layer w0.203: U21.10@-2.05,4.6 -1.999,4.651 -1.707,4.651 -1.164,5.194 -1.164,6.108 -0.522,6.75 -0.522,7.718 -0.326,7.915 -0.326,8.216 0.024,8.565 0.024,9.098 -0.319,9.441 -1.291,9.441 U22.3@-1.3,9.45
ch2_lo1: R44.P$1 U22.11 | length 1.6
  Top Layer w0.254: R44.P$1@-4.5,13.1 -4.449,13.1 -4.322,12.973 -4.322,12.76 -4.05,12.487 U22.11@-4.05,11.7
ch2_lo2: R46.P$1 U22.10 | length 1.4
  Top Layer w0.254: R46.P$1@-3.6,13.1 -3.567,13.067 -3.567,11.717 U22.10@-3.55,11.7
ch2_lo3: R48.P$1 U22.9 | length 1.6
  Top Layer w0.254: U22.9@-3.05,11.7 -3.05,12.487 -2.878,12.66 -2.878,12.973 -2.751,13.1 R48.P$1@-2.7,13.1
ch2_mux1: R50.P$2 R51.P$2 R52.P$2 U21.19 | length 4.4
  Top Layer w0.254: R50.P$2@-8.8,2.208 R52.P$2@-7.9,2.208 -6.758,2.208 -6.245,2.721 -6.245,3.069 -5.731,3.583 -5.167,3.583 U21.19@-5.15,3.6
ch2_mux2: R53.P$2 R54.P$2 R55.P$2 U21.18 | length 4.1
  Top Layer w0.254: R53.P$2@-8.8,2.992 R55.P$2@-7.9,2.992 R54.P$2@-7,2.992 -6.982,2.992 -5.892,4.083 -5.167,4.083 U21.18@-5.15,4.1
ch2_mux3: R56.P$2 R57.P$2 R58.P$2 U21.17 | length 4.2
  Top Layer w0.254: R56.P$2@-8.8,5.808 R58.P$2@-7.9,5.808 R57.P$2@-7,5.808 -6.982,5.808 -6.229,5.055 -6.229,4.929 -5.9,4.6 U21.17@-5.15,4.6
ch2_vb1: C23.P$1 D23.K U22.20 | length 9.8
  Top Layer w0.203: U22.20@-4.05,7.7 -4.05,8.701 -3.756,8.995 -3.756,10.225 -3.415,10.566 v1(-3.415,10.633)
  Top Layer w0.254: D23.K@-8.5,7 -8.5,7.049 -8.449,7.1 v1(-7.7,7.1)
  Mid Layer 2 w0.254: v1(-7.7,7.1) -6.529,8.271 -5.968,8.271 -4.606,9.633 -4.415,9.633 v1(-3.415,10.633)
ch2_vb2: C24.P$1 D24.K U22.17 | length 3.5
  Top Layer w0.254: D24.K@-8.5,9.4 -8.5,9.449 -8.449,9.5 C24.P$1@-7.5,9.5 -7.449,9.5 -6.899,8.95 U22.17@-5.3,8.95
ch2_vb3: C25.P$1 D25.K U22.14 | length 4
  Top Layer w0.254: D25.K@-8.5,11.8 -8.45,11.85 -7.399,11.85 -7.322,11.773 -7.322,11.488 -6.803,10.969 -6.498,10.969 -5.978,10.45 U22.14@-5.3,10.45
ch3_c2ck: CK3.P$1 R60.P$1 U31.5 | length 3
  Top Layer w0.254: CK3.P$1@0.8,-1.4 1.951,-1.4 2.4,-0.951 R60.P$1@2.4,-0.9 2.527,-1.027 2.527,-1.235 2.85,-1.558 U31.5@2.85,-1.85
ch3_c2d: CD3.P$1 U31.6 | length 1.8
  Top Layer w0.254: CD3.P$1@0.8,-2.7 0.869,-2.7 1.419,-2.15 U31.6@2.35,-2.15
ch3_com_all: R71.P$1 R74.P$1 R77.P$1 U31.20 | length 7.8
  Top Layer w0.254: U31.20@5.15,-2.65 5.442,-2.65 5.467,-2.625 5.467,-1.533 6.394,-0.606 6.994,-0.606 v1(7,-0.6) 7,-0.75 R71.P$1@7.05,-0.8 ; R77.P$1@7.025,-4.375 7.025,-4.025 v1(7,-4) 7.025,-3.975 7.025,-3.625 R74.P$1@7.05,-3.6
  Mid Layer 1 w0.254: v1(7,-4) v1(7,-0.6)
ch3_hin1: U31.16 U32.22 | length 5.6
  Top Layer w0.254: v1(2.6,-7.985) 2.638,-7.947 2.779,-7.947 3.033,-7.693 3.033,-7.167 U32.22@3.05,-7.15 ; v1(4.379,-5.823) 4.416,-5.785 4.601,-5.785 4.986,-5.4 4.986,-4.786 U31.16@4.85,-4.65
  Mid Layer 2 w0.254: v1(2.6,-7.985) 4.341,-6.243 4.341,-5.86 v1(4.379,-5.823)
ch3_hin2: U31.14 U32.23 | length 3.1
  Top Layer w0.254: U32.23@2.55,-7.15 2.567,-7.133 2.567,-6.607 2.817,-6.358 3.363,-6.358 3.818,-5.903 3.818,-5.599 3.833,-5.584 3.833,-4.967 U31.14@3.85,-4.95
ch3_hin3: U31.11 U32.24 | length 2.6
  Top Layer w0.254: U32.24@2.05,-7.15 2.05,-5.932 2.35,-5.632 U31.11@2.35,-4.65
ch3_ho1: R61.P$1 U32.19 | length 1.9
  Top Layer w0.203: U32.19@4.55,-7.15 4.55,-7.249 4.601,-7.3 R61.P$1@6.3,-7.3
ch3_ho2: R62.P$1 U32.16 | length 5.6
  Top Layer w0.203: v1(4.3,-8.9) U32.16@5.3,-8.9 ; v1(6.433,-12.466) 6.534,-12.466 R62.P$1@6.6,-12.4
  Mid Layer 1 w0.203: v1(4.3,-8.9) 4.3,-9.987 6.432,-12.119 v1@6.432,-12.465
ch3_ho3: R63.P$1 U32.13 | length 1.3
  Top Layer w0.203: U32.13@5.3,-10.4 5.554,-10.4 5.8,-10.646 R63.P$1@5.8,-11.3